# Altium PCB PDBMCU.PcbDoc (part 1 of 3)
Units mil, origin at the board's own origin, x right, y up, seen from the top; angles counter-clockwise.
Board outline 5245 x 4685 mil, 4 copper layers (Top Layer, Second Layer, Third Layer, Bottom Layer), stack 60.674 mil thick; 139 components, 73 nets, 640 pads, 472 vias.
Unrouted connection lines stored in the file: 2.
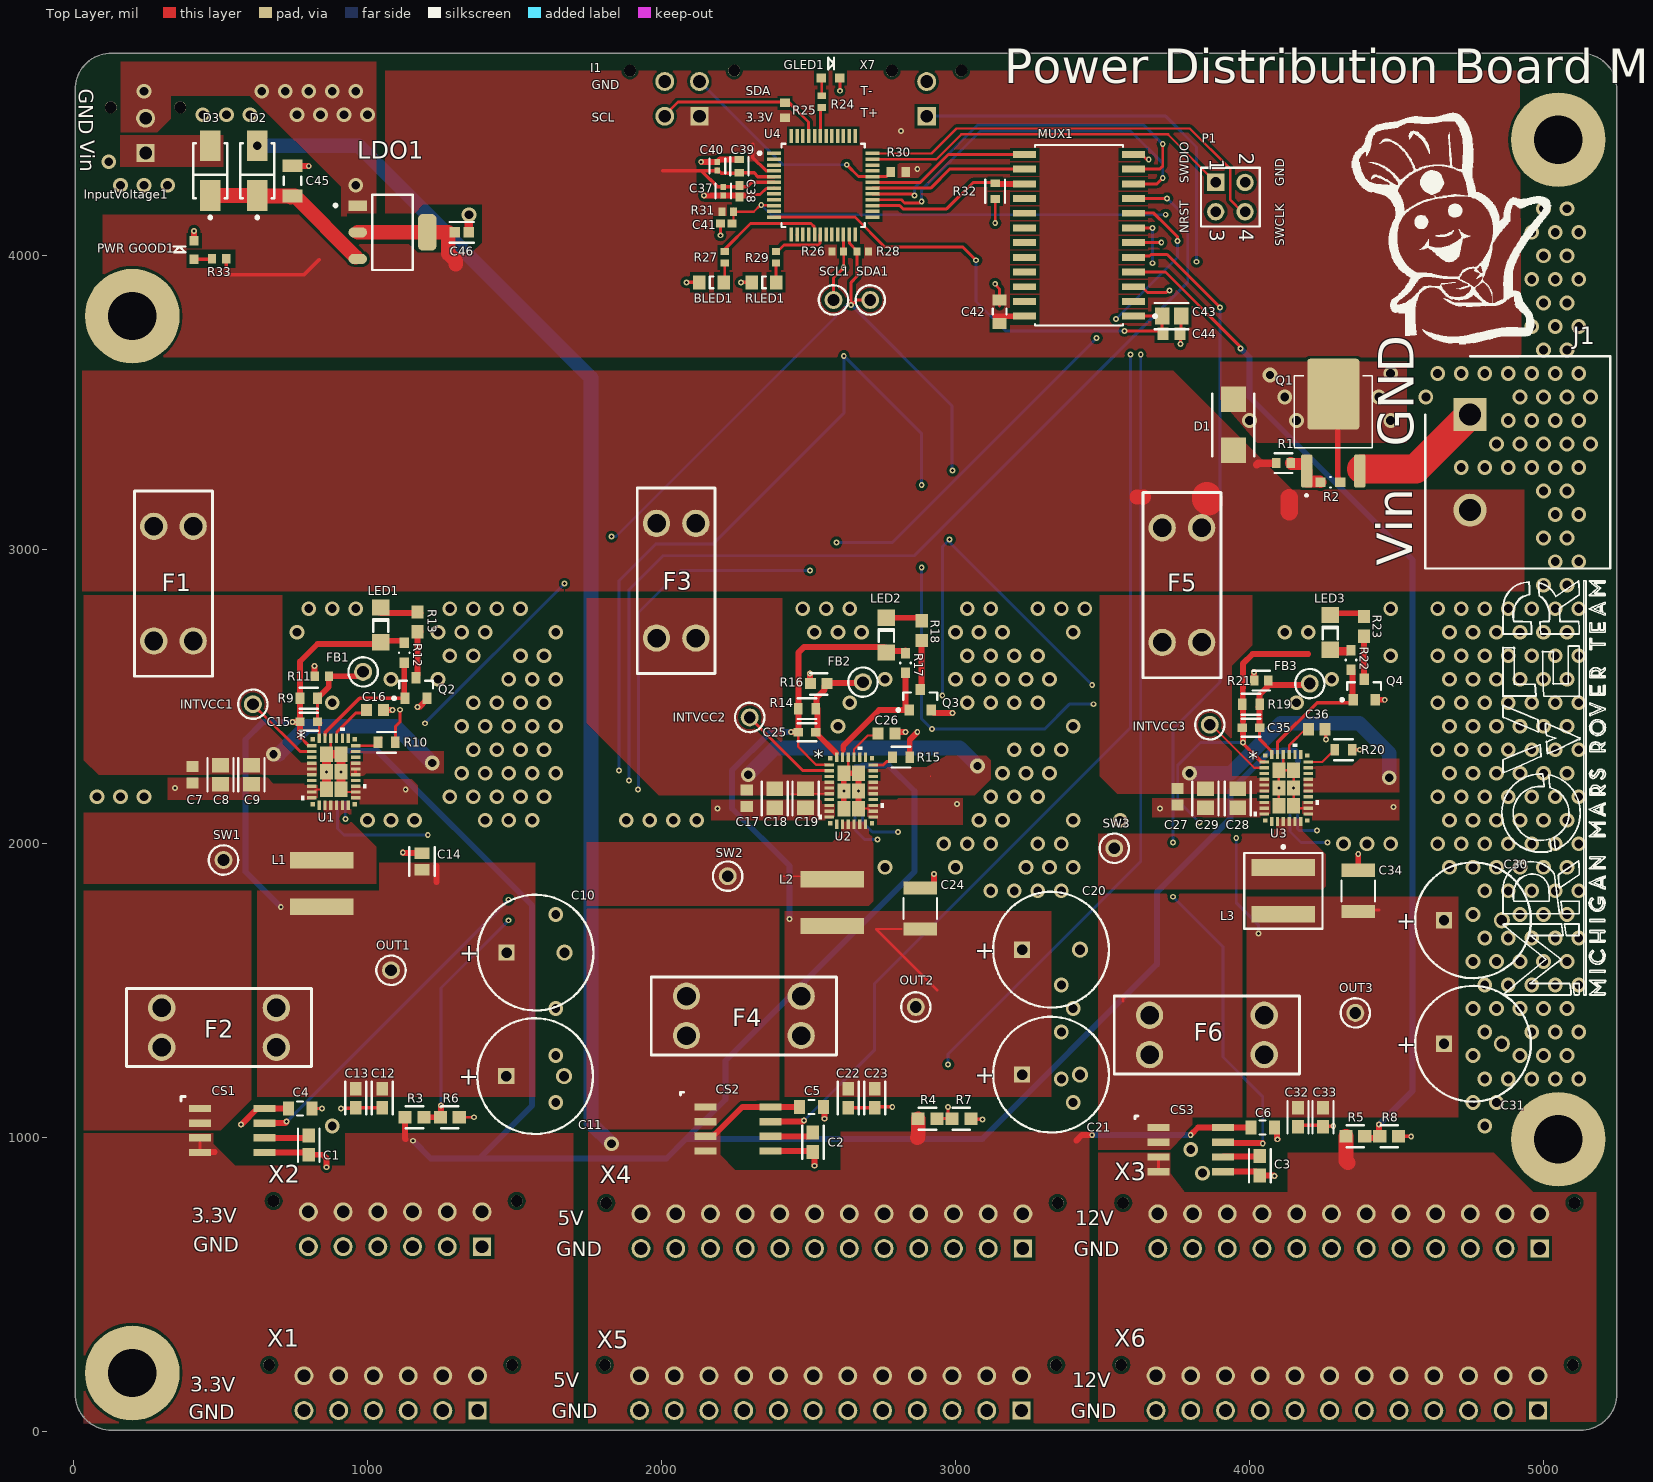
[diagram p0: Top Layer view]
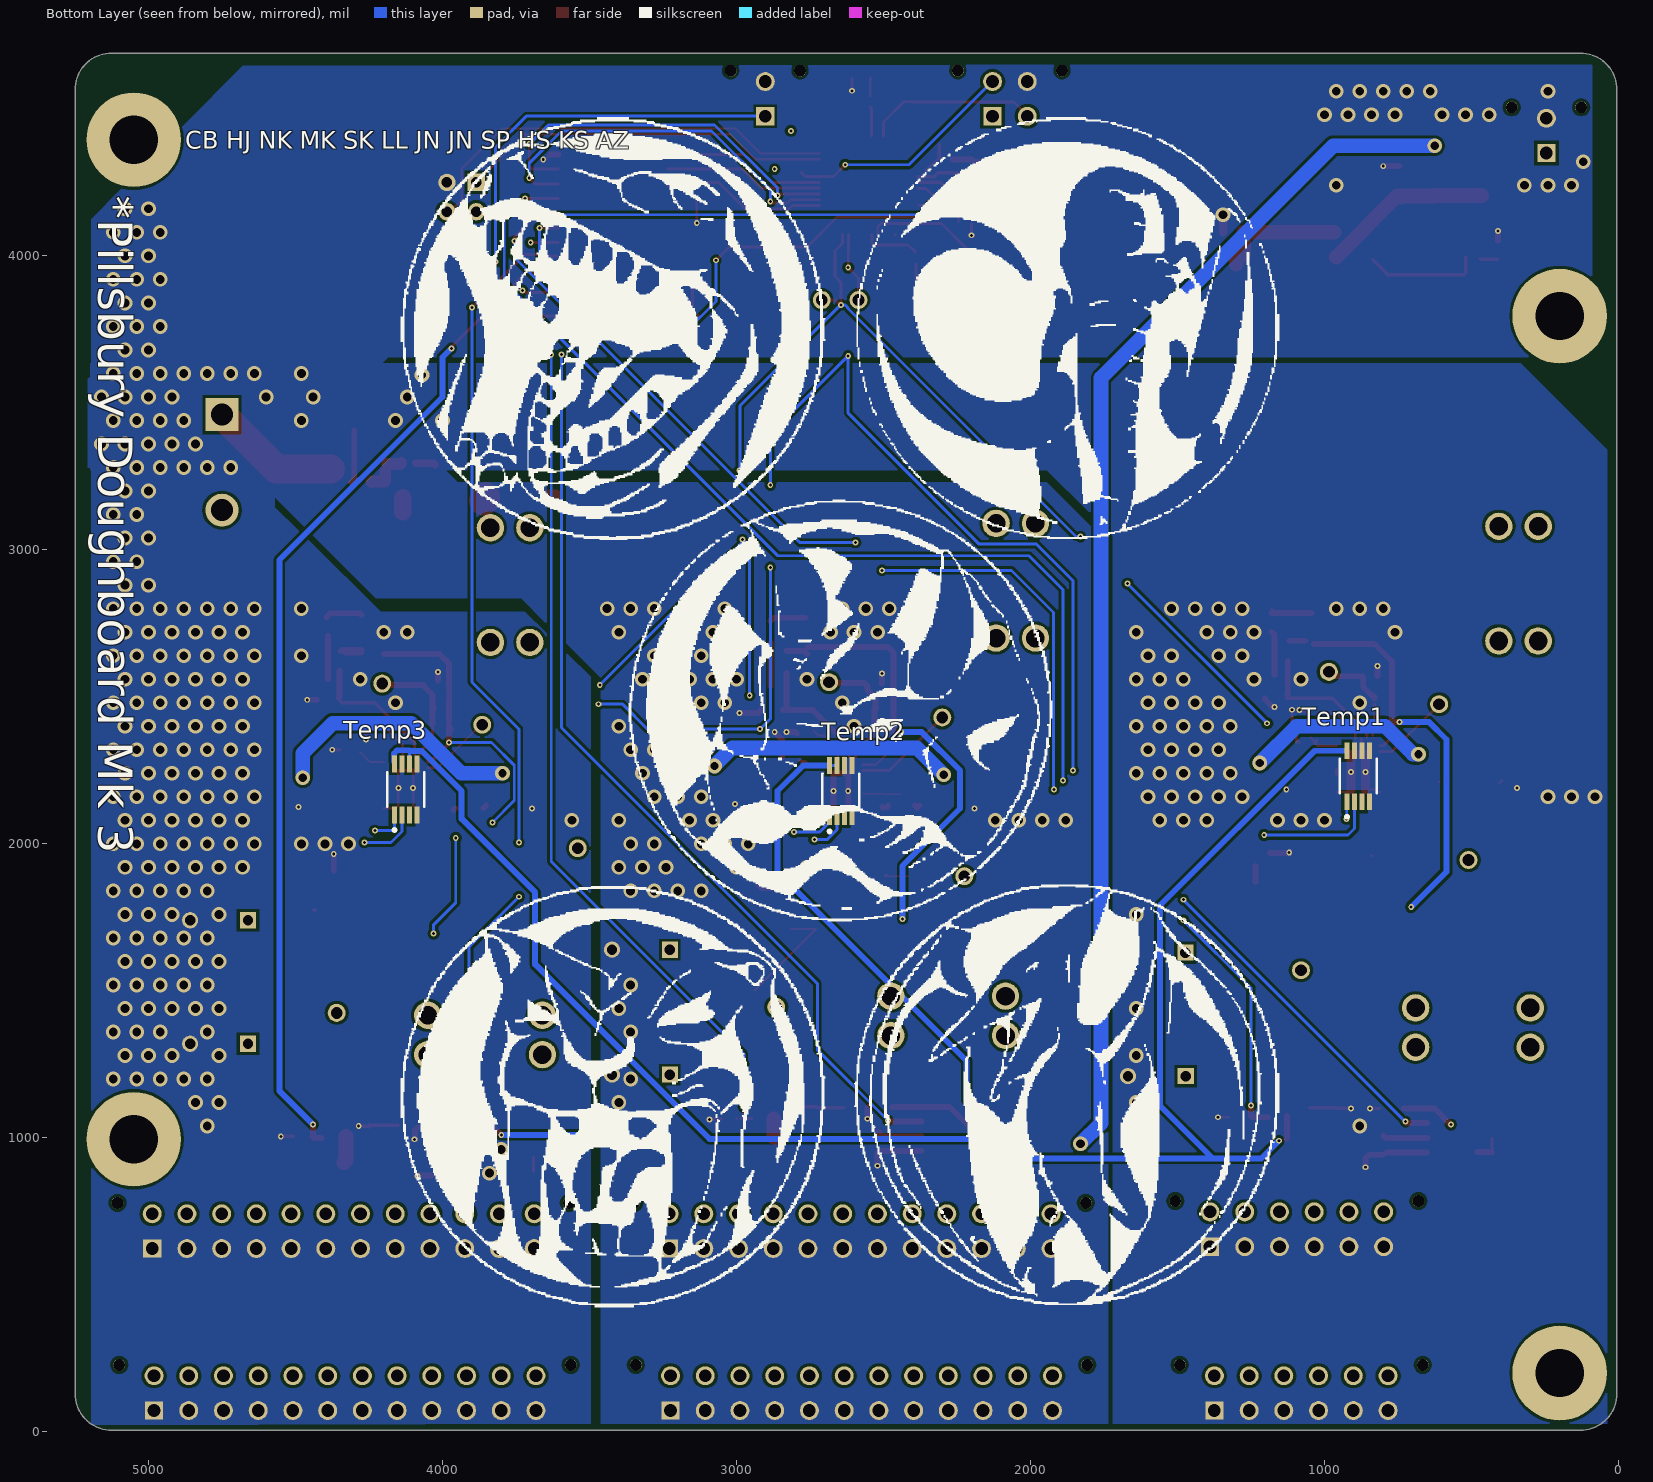
[diagram p1: Bottom Layer view, seen from below]
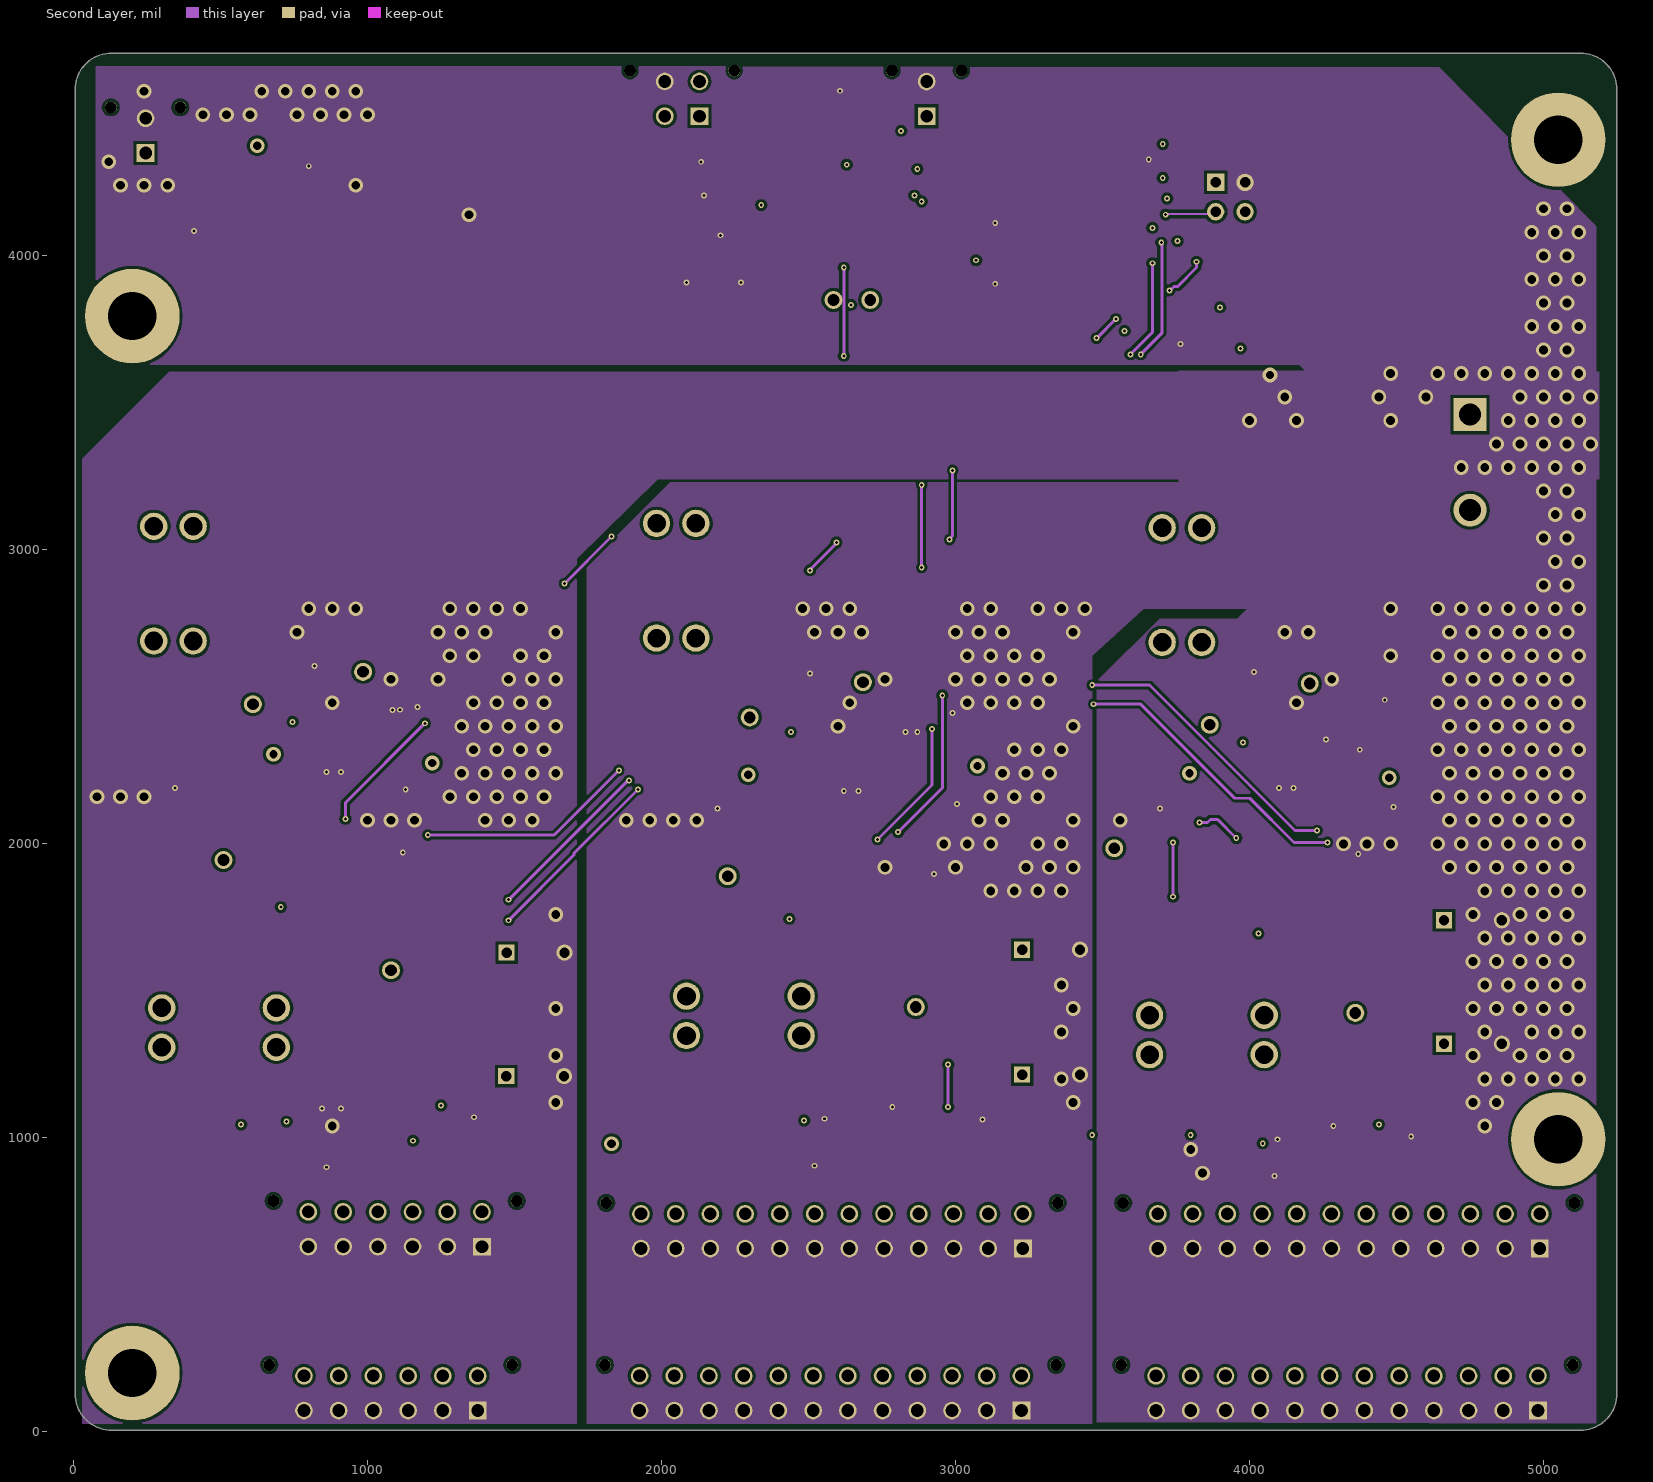
[diagram p2: Second Layer]
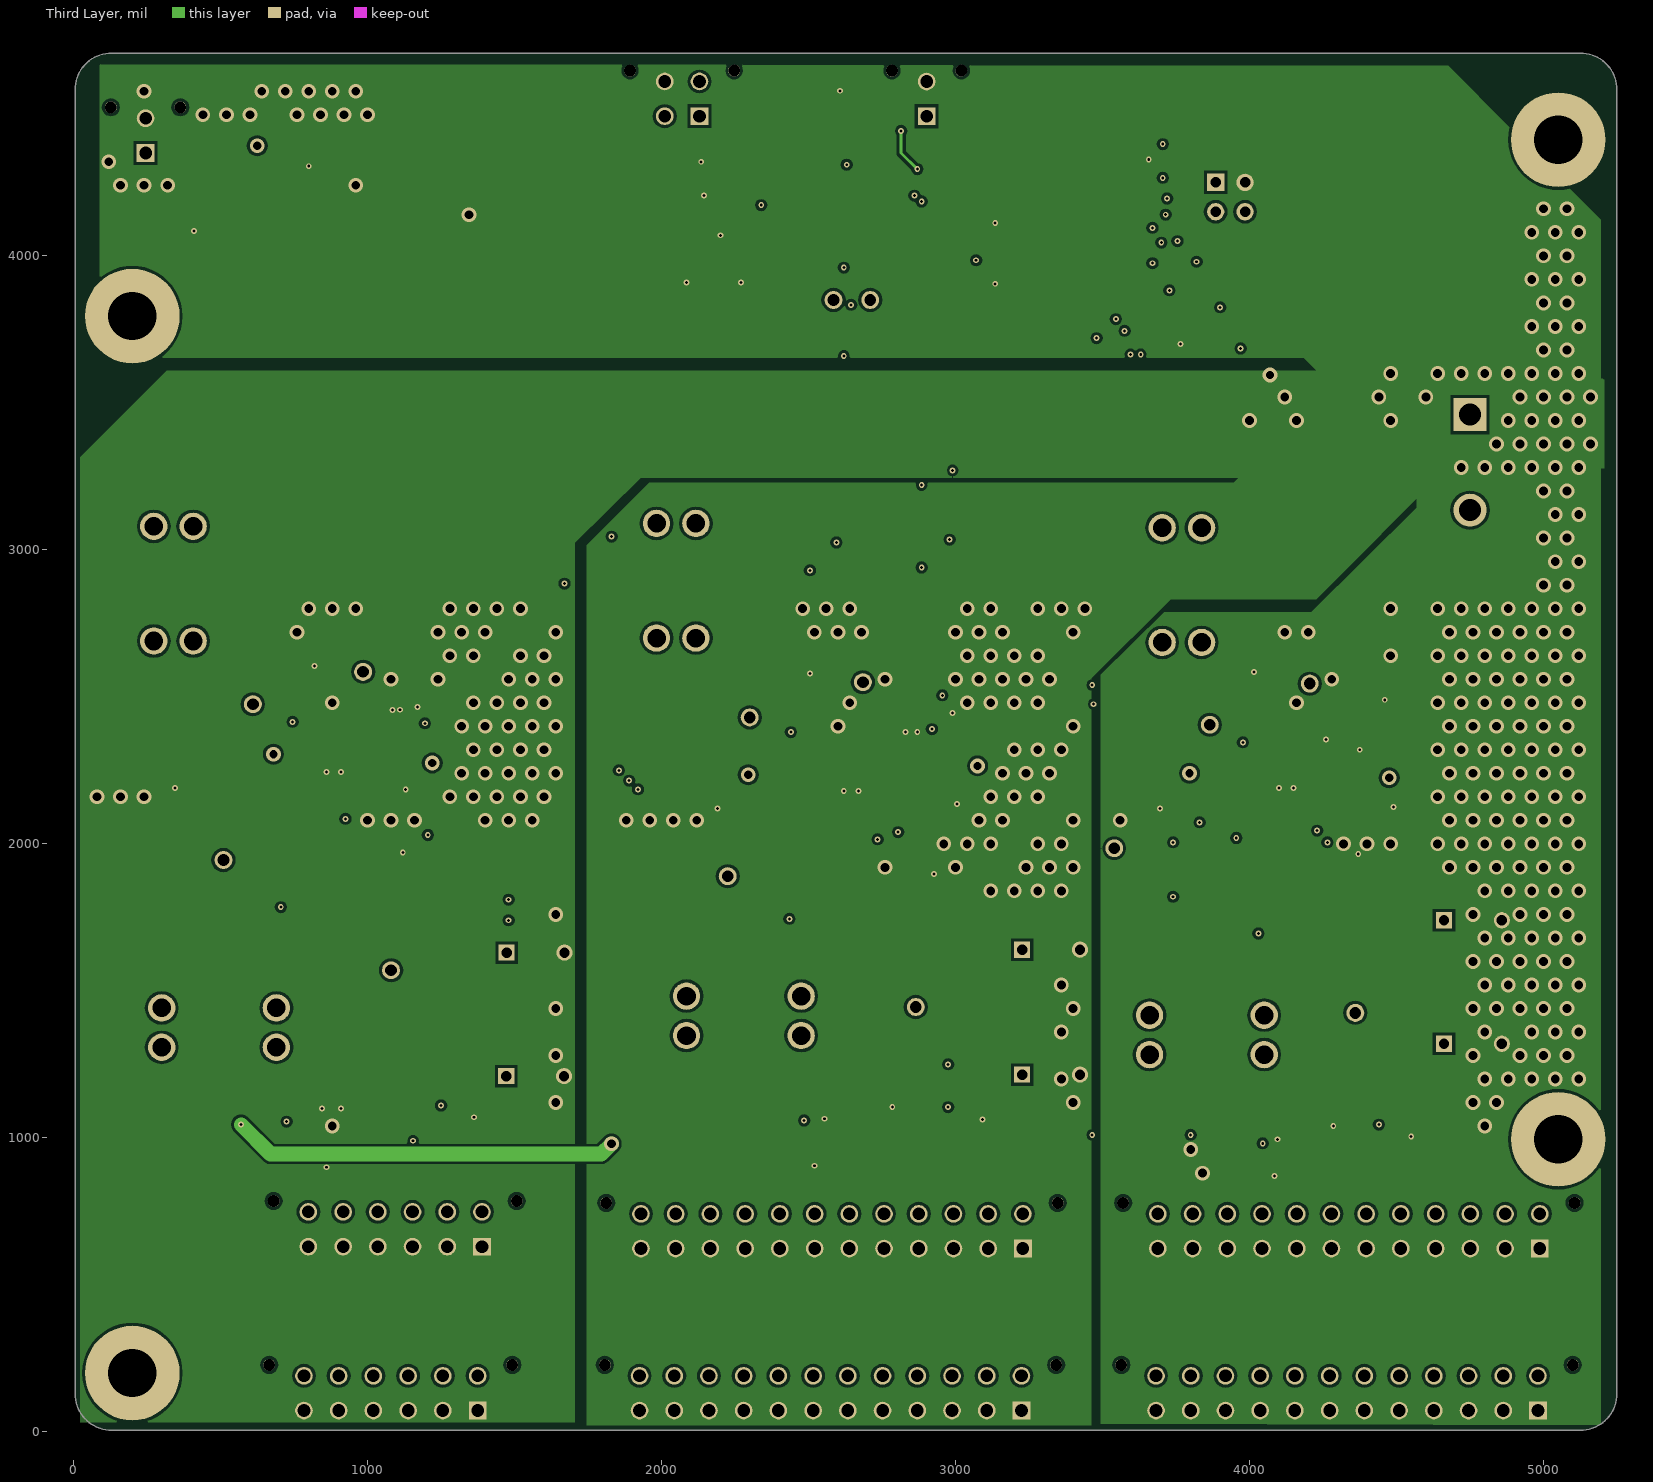
[diagram p3: Third Layer]
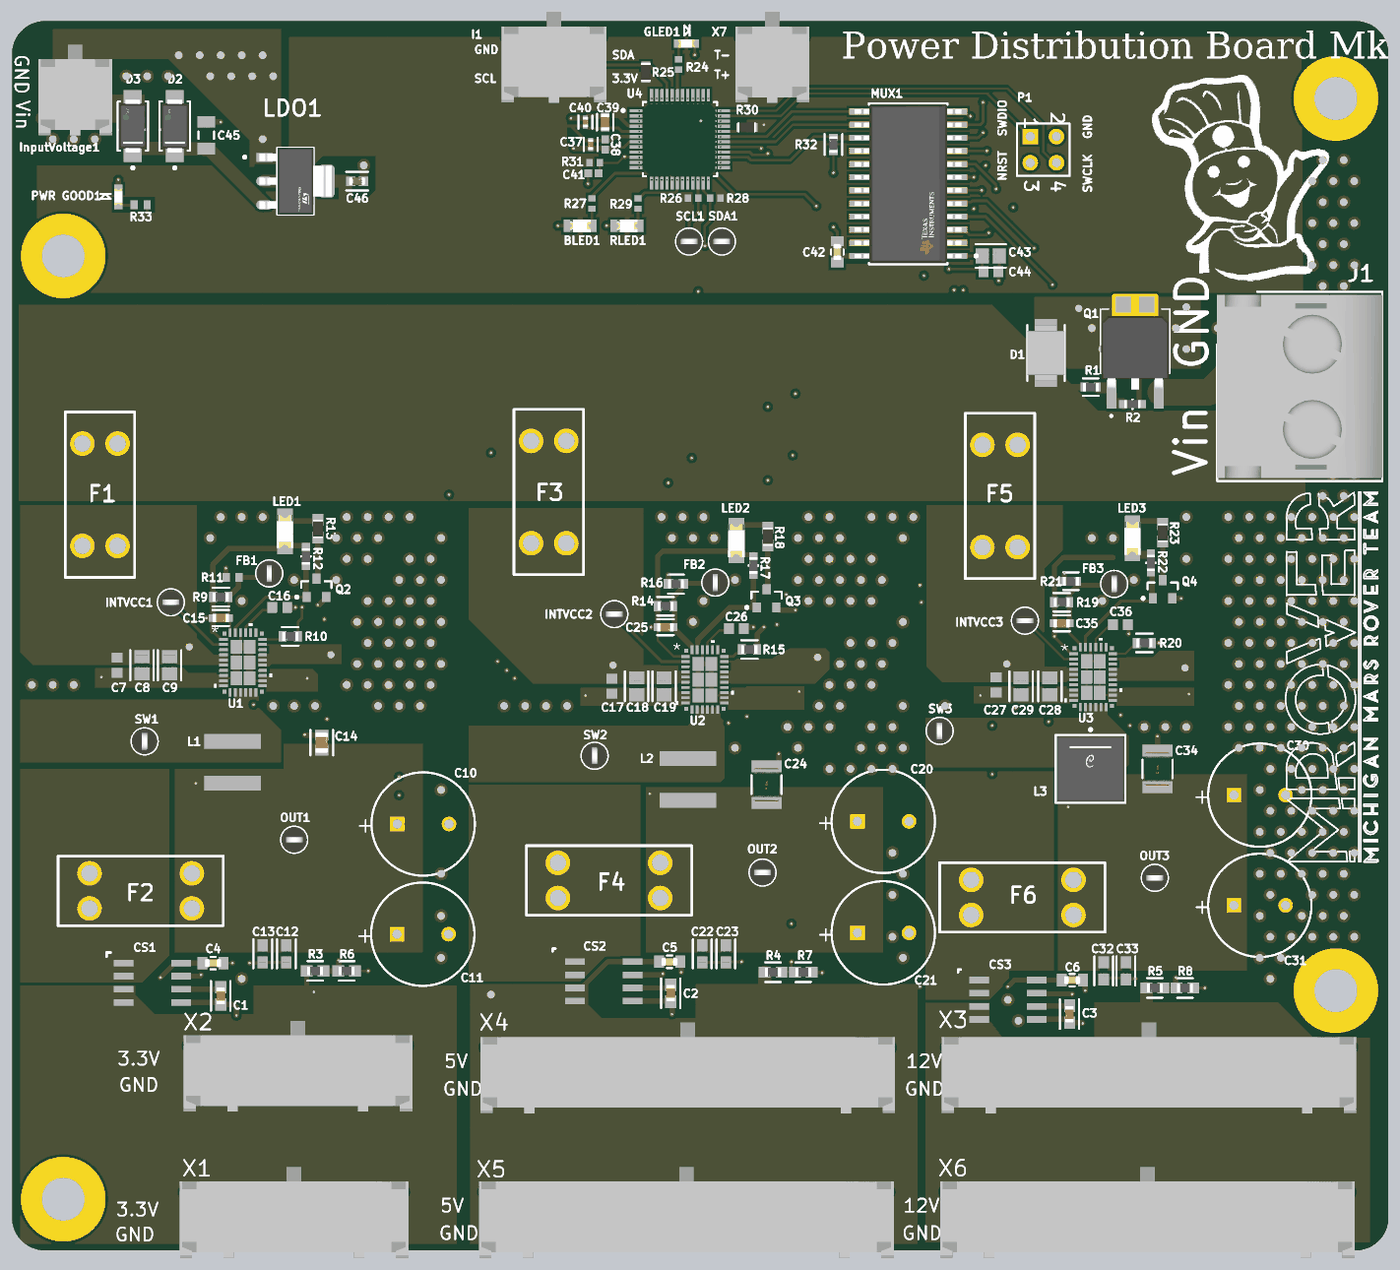
[diagram p5: 3D render of the assembled board from above, using the file's embedded part models]
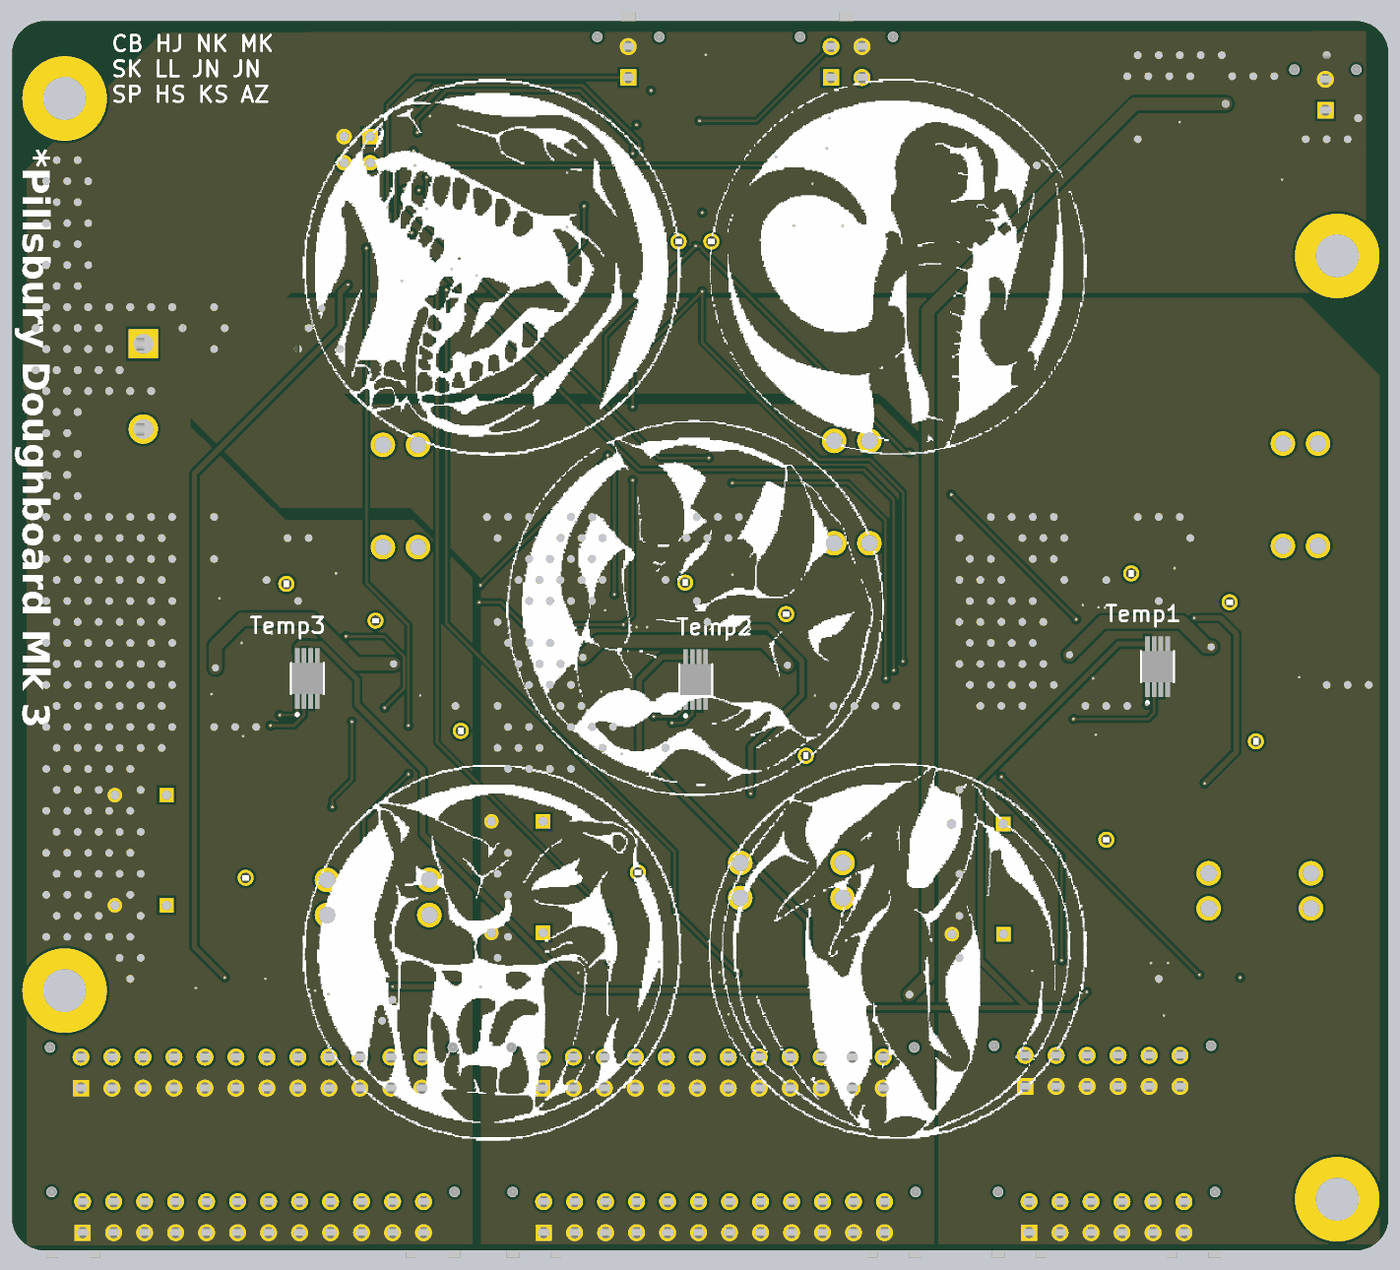
[diagram p6: 3D render of the assembled board from below, using the file's embedded part models]

## Layer stack, top to bottom
Top Solder: solder mask 0.4, Solder Resist, Dk 3.5
Top Layer: signal copper 1.4
Dielectric 4: prepreg 7.874, PP-006, Dk 4.1
Second Layer: signal copper 1.378
Dielectric 1: core 39.37, Core-009, Dk 4.5
Third Layer: signal copper 1.378
Dielectric 5: prepreg 7.874, PP-006, Dk 4.1
Bottom Layer: signal copper 1.4
Bottom Solder: solder mask 0.4, Solder Resist, Dk 3.5

## Board outline
130,5 cw(c130,130) 5,130 5,4565 cw(c130,4565) 130,4690 5125,4690 cw(c5125,4565) 5250,4565 5250,130 cw(c5125,130) 5125,5

## Design rules (kind name [scope] priority, off if disabled: settings)
Clearance [All] p1: gap=10 ignorepadtopadclearanceinfootprint=TRUE except(0: Arc-Hole Track-Hole SMDPad-Hole THPad-Hole Via-Hole Fill-Hole Poly-Hole Region-Hole Text-Hole; 6: Arc-Arc Arc-Track Arc-SMDPad Track-Track Track-SMDPad)
PolygonConnect [All] p1: connectstyle=Direct reliefconductorwidth=10 reliefentries=4 polygonreliefangle="90 Angle" airgapwidth=10
RoutingVias [All] p1: holewidth=28 width=50 viastyle="Through Hole" minholewidth=10 minwidth=20 maxholewidth=10 maxwidth=20
SolderMaskExpansion [isVia] p1: expansion=4 istentingtop=TRUE
Width [All] p1: maxlimit=200 minlimit=5 preferedwidth=10 minimp=50.000000 maximp=50.000000 favimp=50.000000
30 further rules are at their usual default settings.

## Classes and differential pairs
component class Connectors: I1 P1
component class Power: C45 C46 D2 D3 LDO1 "PWR GOOD1" R33
component class MCU: BLED1 C37 C38 C39 C40 C41 GLED1 InputVoltage1 R24 R27 R29 R32 R33 RLED1 SCL1 SDA1 U4
component class Analog_Mux: C42 C43 C44 MUX1 R32 X1
component class 12V: C27 C28 C29 C30 C31 C32 C33 C34 C35 C36 F5 F6 FB3 INTVCC3 L3 LED3 OUT3 Q4 R19 R20 R21 R22 R23 SW3 U3
component class 5V: C17 C18 C19 C20 C21 C22 C23 C24 C25 C26 F3 F4 FB2 INTVCC2 L2 LED2 OUT2 Q3 R14 R15 R16 R17 R18 SW2 U2
component class 3.3V: C7 C8 C9 C10 C11 C12 C13 C14 C15 C16 F1 F2 FB1 INTVCC1 L1 LED1 OUT1 Q2 R9 R10 R11 R12 R13 SW1 U1

## Components (designator, comment, footprint, x,y, rotation, side; value= is the part's Value field where it differs from the comment)
BLED1 "150080BS75000" 0805_A 2170,3910 r0 top
C1 "1n" FP-0603-L_1_6_0_15-W_0_81-IPC_A 800,975 r270 top
C2 "1n" FP-0603-L_1_6_0_15-W_0_81-IPC_A 2515,985 r270 top
C3 "1n" FP-0603-L_1_6_0_15-W_0_81-IPC_A 4035,905 r270 top
C4 "100n" FP-CGA3E-0_3-0_1-IPC_A 771.06,1100 r0 top
C5 "100n" FP-CGA3E-0_3-0_1-IPC_A 2510.35,1105 r0 top
C6 "100n" FP-CGA3E-0_3-0_1-IPC_A 4045,1035 r0 top
C7 "4.7p" CAPC1608X90X35ML10T15 405,2235 r90 top
C8 "0.47p" FP-CL21-IPC_B 500,2235 r270 top
C9 "0.47p" FP-CL21-IPC_B 605,2235 r270 top
C10 "220uF" CAPPR65-500-1250X1000X1350 1571.57,1630 r0 top
C11 "220uF" CAPPR65-500-1250X1000X1350 1570,1210 r0 top
C12 "100n" FP-CL10-IPC_A 1050,1135 r270 top
C13 "100n" FP-CL10-IPC_A 960,1135 r270 top
C14 "10u" FP-GRM21B-0_15-IPC_C 1185,1940 r90 top
C15 "4.7p" FP-0603-L_1_6_0_15-W_0_81-MFG 800,2415 r0 top
C16 "22n" CAPC1608X90X35ML10T15 1025,2455 r180 top
C17 "4.7p" CAPC1608X90X35ML10T15 2290,2155 r90 top
C18 "0.47p" FP-CL21-IPC_B 2385,2155 r270 top
C19 "0.47p" FP-CL21-IPC_B 2490,2155 r270 top
C20 "220uF" CAPPR65-500-1250X1000X1350 3325,1640 r0 top
C21 "220uF" CAPPR65-500-1250X1000X1350 3325,1215 r0 top
C22 "100n" FP-CL10-IPC_A 2635,1135 r270 top
C23 "100n" FP-CL10-IPC_A 2725,1135 r270 top
C24 "10u" FP-CGA6P-IPC_A 2880,1780 r90 top
C25 "4.7p" FP-0603-L_1_6_0_15-W_0_81-MFG 2495,2380 r0 top
C26 "22n" CAPC1608X90X35ML10T15 2765,2375 r180 top
C27 "4.7p" CAPC1608X90X35ML10T15 3755,2160 r90 top
C28 "0.47p" FP-CL21-IPC_B 3960,2155 r270 top
C29 "0.47p" FP-CL21-IPC_B 3850,2155 r270 top
C30 "220uF" CAPPR65-500-1250X1000X1350 4760,1740 r0 top
C31 "220uF" CAPPR65-500-1250X1000X1350 4760,1320 r0 top
C32 "100n" FP-CL10-IPC_A 4165,1070 r270 top
C33 "100n" FP-CL10-IPC_A 4250,1070 r270 top
C34 "10u" FP-CGA6P-IPC_A 4370,1840 r90 top
C35 "4.7p" FP-0603-L_1_6_0_15-W_0_81-MFG 4005,2395 r0 top
C36 "22n" CAPC1608X90X35ML10T15 4228.54,2390 r180 top
C37 "4.7u" FP-CL282-IPC_C 2210,4220 r270 top
C38 "100n" CAPC1050X55X23ML05T13 2265,4220 r90 top
C39 "100n" FP-CL10-0_1-MFG 2265,4305 r90 top value=100nF
C40 "1u" FP-CL542-IPC_C 2190,4305 r90 top
C41 "100n" CAPC1050X55X23ML05T13 2220,4110 r0 top
C42 "100n" FP-CGA3E-0_3-0_1-IPC_A 3150,3810 r90 top
C43 "0.47p" FP-CL21-IPC_B 3735,3795 r0 top
C44 "4.7p" CAPC1608X90X35ML10T15 3735,3735 r180 top
C45 "1u" CAPC3216X110X50LL20T25 745,4255 r270 top
C46 "4.7u" FP-GRM188-0_2-IPC_C 1320,4080 r0 top
CS1 "ACHS-7121-000E" ACHS-7121-000E 540,1025 r270 top
CS2 "ACHS-7121-000E" ACHS-7121-000E 2260,1030 r270 top
CS3 "ACHS-7121-000E" ACHS-7121-000E 3800.32,960 r270 top
D1 "SMBJ43CA-Q" DIONM5436X244N 3945,3425 r90 top
D2 "SS14" FP-403AE-MFG 625,4290 r270 top
D3 "SS14" FP-403AE-MFG 465,4290 r270 top
F1 "36-3568-ND" PCBComponent_1#1 340,2885 r90 top
F2 "36-3568-ND" PCBComponent_1#1 495,1375 r180 top
F3 "36-3568-ND" PCBComponent_1#1 2050,2895 r90 top
F4 "36-3568-ND" PCBComponent_1#1 2280,1415 r180 top
F5 "36-3568-ND" PCBComponent_1#1 3770,2880 r90 top
F6 "36-3568-ND" PCBComponent_1#1 3855,1350 r180 top
FB1 "5001" KSTN-5001 985,2585 r0 top
FB2 "5001" KSTN-5001 2685,2550 r0 top
FB3 "5001" KSTN-5001 4205,2545 r0 top
GLED1 "150060VS75000" WE-150060VS75000_V 2575,4605 r180 top
I1 "Molex - Micro-Fit 3.0 Series connector,  3.00mm (0.118\") pitch header, 4 positions." 44914-0401 2070,4475 r0 top
InputVoltage1 "Molex - Micro-Fit 3.0 Series connector,  3.00mm (0.118\") pitch header, 2 positions." 44914-0201 245,4350 r0 top
INTVCC1 "5001" KSTN-5001 610,2475 r90 top
INTVCC2 "5001" KSTN-5001 2300,2430 r90 top
INTVCC3 "5001" KSTN-5001 3865,2405 r90 top
J1 "1546927-2" SHDR2W119P0X826_1X2_1770X1549X1549P 4750,3460 r270 top
L1 "1u" PCBComponent_1#2 845,1865 r270 top
L2 "1u" PCBComponent_1#2 2580,1800 r270 top
L3 "4.7u" FP-XAL6060-472MEC-MFG 4115,1840 r270 top
LDO1 "LDL1117S33R" FP-SOT223-0046067-IPC_C 1085,4080 r0 top
LED1 "150120VS75000" 1206_A 1045,2745 r270 top
LED2 "150120VS75000" 1206_A 2765,2710 r270 top
LED3 "150120VS75000" 1206_A 4275,2719.06 r270 top
MUX1 "CD74HC4067M96" FP-DW0024A-MFG 3420,4070 r180 top
OUT1 "5001" KSTN-5001 1080,1570 r90 top
OUT2 "5001" KSTN-5001 2865,1445 r90 top
OUT3 "5001" KSTN-5001 4360,1425 r90 top
P1 "Header 2X2" HDR2X2 3885,4250 r270 top
"PWR GOOD1" "150060VS75000" WE-150060VS75000_V 410,4020 r270 top
Q1 "IRLR2705TRPBF" IRLR2705TRPBF 4285,3431.18 r90 top
Q2 "IRLML0060TRPBF" INTR-SOT-23-3_V 1165,2530 r0 top
Q3 "IRLML0060TRPBF" INTR-SOT-23-3_V 2880,2490 r0 top
Q4 "IRLML0060TRPBF" INTR-SOT-23-3_V 4390,2525 r0 top
R1 "200k" FP-CRCW0603-e3-IPC_C 4115.77,3295 r0 top
R2 "100k" FP-RC0603-0_55-MFG 4275,3230 r0 top
R3 "3.9k" FP-CRCW0603-e3-IPC_A 1160,1070 r180 top
R4 "3.9k" FP-CRCW0603-e3-IPC_A 2905,1065 r180 top
R5 "3.9k" FP-CRCW0603-e3-IPC_A 4360,1005 r180 top
R6 "300" FP-CRCW0603-e3-IPC_A 1280,1070 r180 top
R7 "300" FP-CRCW0603-e3-IPC_A 3020,1065 r180 top
R8 "300" FP-CRCW0603-e3-IPC_A 4475,1005 r180 top
R9 "1M" FP-CRCW0603-e3-MFG 800,2495 r180 top
R10 "41.2k" FP-CRCW0603-e3-MFG 1065,2345 r180 top
R11 "412k" RESC1608X55X30LL15T15 845,2570 r0 top
R12 "100k" FP-RC0603-0_55-MFG 1125,2650 r90 top
R13 "120" RESC1609X55X30ML15T15 1170,2755 r90 top
R14 "1M" FP-CRCW0603-e3-MFG 2495,2460 r180 top
R15 "41.2k" FP-CRCW0603-e3-MFG 2815,2295 r180 top
R16 "232k" FP-CRCW0603-e3-IPC_B 2535,2545 r0 top
R17 "100k" FP-RC0603-0_55-MFG 2830,2615 r90 top
R18 "120" RESC1609X55X30ML15T15 2885,2725 r90 top
R19 "1M" FP-CRCW0603-e3-MFG 4005,2475 r180 top
R20 "41.2k" FP-CRCW0603-e3-MFG 4320,2320 r180 top
R21 "82k" FP-CRCW0603-e3-IPC_C 4040,2555 r0 top
R22 "100k" FP-RC0603-0_55-MFG 4345,2625 r90 top
R23 "120" RESC1609X55X30ML15T15 4390,2740 r90 top
R24 "120" 0402WGF1200TCE 2545,4525 r90 top
R25 "10k" RESC1609X55X30LL15T15 2420,4495 r90 top
R26 "4.7k" 0402WGF4701TCE 2600,4015 r180 top
R27 "120" 0402WGF1200TCE 2215,3995 r90 top
R28 "4.7k" 0402WGF4701TCE 2685,4015 r0 top
R29 "120" 0402WGF1200TCE 2390,3995 r90 top
R30 "10k" RESC1609X55X30LL15T15 2805,4285 r180 top
R31 "10k" 0402WGF1002TCE 2225,4150 r0 top
R32 "10k" FP-RC0603-0_55-IPC_C 3135,4220 r90 top
R33 "120" RESC1608X55X30LL15T15 495,3990 r180 top
RLED1 "150080RS75000" 0805_A 2348.66,3910 r0 top
SCL1 "5001" KSTN-5001 2585,3850 r90 top
SDA1 "5001" KSTN-5001 2710,3850 r90 top
SW1 "5001" KSTN-5001 510,1945 r0 top
SW2 "5001" KSTN-5001 2225,1890 r0 top
SW3 "5001" KSTN-5001 3540,1985 r0 top
Temp1 "MCP9808T-E/MS" FP-C04-111-MFG 885,2230 r90 bottom
Temp2 "MCP9808T-E/MS" FP-C04-111-MFG 2645,2180 r90 bottom
Temp3 "MCP9808T-E/MS" FP-C04-111-MFG 4125,2185 r90 bottom
U1 "LT8645SEV" LQFN-32 885,2245 r0 top value=Value
U2 "LT8645SEV" LQFN-32 2645,2180 r0 top value=Value
U3 "LT8645SEV" LQFN-32 4125,2190 r0 top value=Value
U4 "STM32G050CBT6" FP-LQFP48-5B-MFG 2550,4240 r0 top
X1 "Molex - Micro-Fit 3.0 Series connector,  3.00mm (0.118\") pitch header, 12 positions." 44914-1201 1079.06,72.5 r0 top
X2 "Molex - Micro-Fit 3.0 Series connector,  3.00mm (0.118\") pitch header, 12 positions." 44914-1201 1094.06,630 r0 top
X3 "Molex - Micro-Fit 3.0 Series connector,  3.00mm (0.118\") pitch header, 24 positions." 44914-2401 4337.83,623.43 r0 top
X4 "Molex - Micro-Fit 3.0 Series connector,  3.00mm (0.118\") pitch header, 24 positions." 44914-2401 2579.72,623.43 r0 top
X5 "Molex - Micro-Fit 3.0 Series connector,  3.00mm (0.118\") pitch header, 24 positions." 44914-2401 2574.72,72.5 r0 top
X6 "Molex - Micro-Fit 3.0 Series connector,  3.00mm (0.118\") pitch header, 24 positions." 44914-2401 4331.61,72.5 r0 top
X7 "Molex - Micro-Fit 3.0 Series connector,  3.00mm (0.118\") pitch header, 2 positions." 44914-0201 2901.89,4474.88 r0 top

## Footprints (in the part's own frame and the unit in brackets; to place one, negate y for a bottom-side part, rotate by r counter-clockwise, add the part's x,y. Pads: shape width x height; smd on the part's side, far side on the other; paste and mask are expansions set on the pad)
0402WGF1002TCE [mm] "1/16W ±1% ±100ppm/? 10kO 0402 Chip Resistor - Surface Mount ROHS"
  rect 0.6x0.7 smd: 1(-0.5,0) 2(0.5,0)
0402WGF1200TCE [mm] "±1% 1/16W ±100ppm/? 120O 0402 Chip Resistor - Surface Mount ROHS"
  rect 0.6x0.7 smd: 1(-0.5,0) 2(0.5,0)
0402WGF4701TCE [mm] "1/16W ±1% 4.7kO ±100ppm/? 0402 Chip Resistor - Surface Mount ROHS"
  rect 0.6x0.7 smd: 1(-0.5,0) 2(0.5,0)
0805_A [mm] "Chip LED, 2-Leads, Body 2.0x1.3mm, IPC Medium Density"
  rect 1.1x1.2 smd: 1(-1.05,0) 2(1.05,0)
  silkscreen extent -0.15,-0.5 0.15,0.5, body extent -1,-0.62 1,0.63, height 0.68
1206_A [mm] "Chip LED, 2-Leads, Body 3.2x1.6mm, IPC Medium Density"
  rect 1.4x1.5 smd: 1(-1.5,0) 2(1.5,0)
  silkscreen extent -0.5,-0.66 0.6,0.65, body extent -1.6,-0.8 1.6,0.8, height 0.68
44914-0201 [mm]
  round 1.02 hole 1.02 unplated: 1(-3,3.94) 1(3,3.94)
  rect 1.583x1.583 / inner rect 1.524x1.524 / far side rect 1.583x1.583 hole 1.09: P$1(0,0)
  round 1.635 / inner round 1.524 / far side round 1.635 hole 1.09: P$2(0,3)
  body extent -3.57,-2.45 3.58,6.35, height 10.03
44914-0401 [mm]
  round 1.02 hole 1.02 unplated: 1(-4.5,3.94) 1(4.5,3.94)
  rect 1.583x1.583 / inner rect 1.524x1.524 / far side rect 1.583x1.583 hole 1.09: P$1(1.5,0)
  round 1.635 / inner round 1.524 / far side round 1.635 hole 1.09: P$2(-1.5,0) P$3(1.5,3) P$4(-1.5,3)
  body extent -5.07,-2.45 5.08,6.35, height 10.03
44914-1201 [mm]
  round 1.02 hole 1.02 unplated: 1(-10.5,3.94) 1(10.5,3.94)
  rect 1.583x1.583 / inner rect 1.524x1.524 / far side rect 1.583x1.583 hole 1.09: P$1(7.5,0)
  round 1.635 / inner round 1.524 / far side round 1.635 hole 1.09: P$2(4.5,0) P$3(1.5,0) P$4(-1.5,0) P$5(-4.5,0) P$6(-7.5,0) P$7(7.5,3) P$8(4.5,3) P$9(1.5,3) P$10(-1.5,3) P$11(-4.5,3) P$12(-7.5,3)
  body extent -11.07,-2.45 11.08,6.35, height 10.03
44914-2401 [mm]
  round 1.02 hole 1.02 unplated: 1(-19.5,3.94) 1(19.5,3.94)
  rect 1.583x1.583 / inner rect 1.524x1.524 / far side rect 1.583x1.583 hole 1.09: P$1(16.5,0)
  round 1.635 / inner round 1.524 / far side round 1.635 hole 1.09: P$2(13.5,0) P$3(10.5,0) P$4(7.5,0) P$5(4.5,0) P$6(1.5,0) P$7(-1.5,0) P$8(-4.5,0) P$9(-7.5,0) P$10(-10.5,0) P$11(-13.5,0) P$12(-16.5,0) P$13(16.5,3) P$14(13.5,3) P$15(10.5,3) P$16(7.5,3) P$17(4.5,3) P$18(1.5,3) P$19(-1.5,3) P$20(-4.5,3) P$21(-7.5,3) P$22(-10.5,3) P$23(-13.5,3) P$24(-16.5,3)
  body extent -20.07,-2.45 20.08,6.35, height 10.03
ACHS-7121-000E [mil]
  rect 25x75 smd: 1(-75,-110) 2(-25,-110) 3(25,-110) 4(75,-110) 5(75,110) 6(25,110) 7(-25,110) 8(-75,110)
CAPC1050X55X23ML05T13 [mm] "Chip Capacitor, 2-Leads, Body 1.05x0.55mm, IPC Low Density"
  rect 0.76x0.72 smd: 1(-0.49,0) 2(0.49,0)
  body extent -0.53,-0.28 0.53,0.27, height 0.55
CAPC1608X90X35ML10T15 [mm] "Chip Capacitor, 2-Leads, Body 1.60x0.80mm, IPC Low Density"
  rect 0.95x1.05 smd: 1(-0.725,0) 2(0.725,0)
  body extent -0.85,-0.45 0.85,0.45, height 0.9
CAPC3216X110X50LL20T25 [mm] "Chip Capacitor, 2-Leads, Body 3.20x1.60mm, IPC High Density"
  rect 1.1x1.7 smd: 1(-1.3,0) 2(1.3,0)
  silkscreen extent -0.35,-0.75 0.35,0.75, body extent -1.7,-0.9 1.7,0.9, height 1.1
CAPPR65-500-1250X1000X1350 [mm] "THD, 2-Leads, Dia 10mm, Body Length 12.5mm"
  rect 1.4x1.4 hole 0.9: 1(-2.5,0)
  round 1.4 hole 0.9: 2(2.5,0)
  silkscreen extent -5,-5 5,5, body extent -5,-5 5,5, height 13.5
DIONM5436X244N [mm]
  rect 2.2x2.15 smd: 1(-2.2,0) 2(2.2,0)
  silkscreen extent -2.7,-1.81 2.7,1.81, body extent -2.7,-1.81 2.7,1.81, height 2.31
FP-403AE-MFG [mm]
  rect 2.65x1.75 smd paste+0 mask+0: 1(-2.15,0) 2(2.15,0)
  silkscreen extent -2.37,-1.48 4.17,1.48, body extent -3.57,-1.58 3.57,1.58, height 0.25
FP-0603-L_1_6_0_15-W_0_81-IPC_A [mil]
  rect 47.5x42.06 smd paste+0 mask+0: 1(-32.51,0) 2(32.51,0)
  silkscreen extent -56,-37 56,37, body extent -76,-41 76,41, height 10
FP-0603-L_1_6_0_15-W_0_81-MFG [mm]
  rect 0.8x0.75 smd paste+0 mask+0: 1(-0.75,0) 2(0.75,0)
  silkscreen extent -0.8,-0.77 0.8,0.77, body extent -1.25,-0.58 1.25,0.58, height 0.25
FP-C04-111-MFG [mm]
  rect 1.45x0.45 smd paste+0 mask+0: 1(-2.2,0.975) 2(-2.2,0.325) 3(-2.2,-0.325) 4(-2.2,-0.975) 5(2.2,-0.975) 6(2.2,-0.325) 7(2.2,0.325) 8(2.2,0.975)
  silkscreen extent -3.62,-1.6 1.5,1.6, body extent -1.5,-1.5 1.5,1.5, height 1.1
FP-CGA3E-0_3-0_1-IPC_A [mm]
  rect 0.956x1.206 smd paste+0 mask+0: 1(-1.025,0) 2(1.025,0)
  silkscreen extent -0.25,-0.6 0.25,0.6, body extent -2,-1.1 2,1.1, height 0.25
FP-CGA6P-IPC_A [mm]
  rect 1.153x2.904 smd paste+0 mask+0: 1(-1.775,0) 2(1.775,0)
  silkscreen extent -0.9,-1.45 0.9,1.45, body extent -2.85,-1.95 2.85,1.95, height 0.25
FP-CL10-0_1-MFG [mm]
  rect 0.625x0.825 smd paste+0 mask+0: 1(-0.575,0) 2(0.575,0)
  silkscreen extent -0.8,-0.79 0.8,0.79, body extent -0.99,-0.55 0.99,0.55, height 0.25
FP-CL10-IPC_A [mil]
  rect 45.6x39.85 smd paste+0 mask+0: 1(-32.56,0) 2(32.56,0)
  silkscreen extent -55,-36 55,36, body extent -75,-40 75,40, height 10
FP-CL21-IPC_B [mil]
  rect 49.4x57.33 smd paste+0 mask+0: 1(-32.51,0) 2(32.51,0)
  silkscreen extent -57,-44 57,44, body extent -67,-39 67,39, height 10
FP-CL282-IPC_C [mil]
  rect 20.29x18.6 smd paste+0 mask+0: 1(-14.9,0) 2(14.9,0)
  silkscreen extent -25,-27 25,27, body extent -29,-15 29,15, height 10
FP-CL542-IPC_C [mil]
  rect 20.29x18.6 smd paste+0 mask+0: 1(-14.9,0) 2(14.9,0)
  silkscreen extent -25,-27 25,27, body extent -29,-15 29,15, height 10
FP-CRCW0603-e3-IPC_A [mil]
  rect 44.69x41.82 smd paste+0 mask+0: 1(-32.1,0) 2(32.1,0)
  silkscreen extent -30,-37 30,37, body extent -74,-41 74,41, height 10
FP-CRCW0603-e3-IPC_B [mil]
  rect 36.81x37.88 smd paste+0 mask+0: 1(-28.17,0) 2(28.17,0)
  silkscreen extent -30,-37 30,35, body extent -56,-29 56,29, height 10
FP-CRCW0603-e3-IPC_C [mil]
  rect 28.94x33.94 smd paste+0 mask+0: 1(-24.23,0) 2(24.23,0)
  silkscreen extent -30,-33 30,33, body extent -43,-23 43,23, height 10
FP-CRCW0603-e3-MFG [mm]
  rect 0.75x1 smd paste+0 mask+0: 1(-0.75,0) 2(0.75,0)
  silkscreen extent -0.8,-0.9 0.8,0.9, body extent -1.22,-0.6 1.22,0.6, height 0.25
FP-DW0024A-MFG [mm]
  rect 2x0.6 smd paste-1000 mask+0: 1(-4.7,6.985) 2(-4.7,5.715) 3(-4.7,4.445) 4(-4.7,3.175) 5(-4.7,1.905) 6(-4.7,0.635) 7(-4.7,-0.635) 8(-4.7,-1.905) 9(-4.7,-3.175) 10(-4.7,-4.445) 11(-4.7,-5.715) 12(-4.7,-6.985) 13(4.7,-6.985) 14(4.7,-5.715) 15(4.7,-4.445) 16(4.7,-3.175) 17(4.7,-1.905) 18(4.7,-0.635) 19(4.7,0.635) 20(4.7,1.905) 21(4.7,3.175) 22(4.7,4.445) 23(4.7,5.715) 24(4.7,6.985)
  silkscreen extent -6.7,-7.8 3.8,7.8, body extent -5.8,-7.98 5.8,7.98, height 0.25
FP-GRM21B-0_15-IPC_C [mil]
  rect 39.6x51.5 smd paste+0 mask+0: 1(-28.59,0) 2(28.59,0)
  silkscreen extent -48,-43 48,43, body extent -52,-31 52,31, height 10
FP-GRM188-0_2-IPC_C [mil]
  rect 35.63x35.68 smd paste+0 mask+0: 1(-23.64,0) 2(23.64,0)
  silkscreen extent -41,-35 41,35, body extent -45,-24 45,24, height 10
FP-LQFP48-5B-MFG [mm]
  rect 1.2x0.3 smd paste+0 mask+0: 1(-4.25,2.75) 2(-4.25,2.25) 3(-4.25,1.75) 4(-4.25,1.25) 5(-4.25,0.75) 6(-4.25,0.25) 7(-4.25,-0.25) 8(-4.25,-0.75) 9(-4.25,-1.25) 10(-4.25,-1.75) 11(-4.25,-2.25) 12(-4.25,-2.75) 25(4.25,-2.75) 26(4.25,-2.25) 27(4.25,-1.75) 28(4.25,-1.25) 29(4.25,-0.75) 30(4.25,-0.25) 31(4.25,0.25) 32(4.25,0.75) 33(4.25,1.25) 34(4.25,1.75) 35(4.25,2.25) 36(4.25,2.75)
  rect 0.3x1.2 smd paste+0 mask+0: 13(-2.75,-4.25) 14(-2.25,-4.25) 15(-1.75,-4.25) 16(-1.25,-4.25) 17(-0.75,-4.25) 18(-0.25,-4.25) 19(0.25,-4.25) 20(0.75,-4.25) 21(1.25,-4.25) 22(1.75,-4.25) 23(2.25,-4.25) 24(2.75,-4.25) 37(2.75,4.25) 38(2.25,4.25) 39(1.75,4.25) 40(1.25,4.25) 41(0.75,4.25) 42(0.25,4.25) 43(-0.25,4.25) 44(-0.75,4.25) 45(-1.25,4.25) 46(-1.75,4.25) 47(-2.25,4.25) 48(-2.75,4.25)
  silkscreen extent -5.62,-3.6 3.6,3.6, body extent -4.95,-4.95 4.95,4.95, height 0.25
FP-RC0603-0_55-IPC_C [mil]
  rect 25.93x31.97 smd paste+0 mask+0: 1(-26.64,0) 2(26.64,0)
  silkscreen extent -40,-33 40,33, body extent -44,-22 44,22, height 10
FP-RC0603-0_55-MFG [mm]
  rect 0.9x0.8 smd paste+0 mask+0: 1(-0.85,0) 2(0.85,0)
  silkscreen extent -0.03,-0.45 0.03,0.45, body extent -1.4,-0.55 1.4,0.55, height 0.25
FP-SOT223-0046067-IPC_C [mm]
  rect 1.604x0.88 smd paste+0 mask+0: 1(-3,2.3)
  rrect100% 1.604x0.88 smd paste+0 mask+0: 2(-3,0) 3(-3,-2.3)
  rrect55% 1.604x3.18 smd paste+0 mask+0: 4(3,0)
  silkscreen extent -5.05,-3.25 1.75,3.25, body extent -3.9,-3.35 3.9,3.35, height 0.25
FP-XAL6060-472MEC-MFG [mm]
  rect 1.43x5.5 smd paste+0 mask+0: 1(-2.02,0) 2(2.02,0)
  silkscreen extent -3.92,-3.38 3.28,3.38, body extent -3.38,-3.48 3.38,3.48, height 0.25
HDR2X2 [mm] "Connector; Header; 2x2 Position"
  rect 1.5x1.5 hole 0.9: 1(0,0)
  round 1.5 hole 0.9: 2(0,2.54) 3(2.54,0) 4(2.54,2.54)
  silkscreen extent -1.27,-1.27 3.81,3.81
INTR-SOT-23-3_V [mm] "SOT23, 3-Leads, Body 2.92x1.3mm, Pitch 1.9mm"
  rect 0.802x0.972 smd: 1(-0.95,-0.885) 2(0.95,-0.885) 3(0,0.885)
  silkscreen extent -2.03,-1.01 1.46,0.64, body extent -1.46,-0.65 1.46,0.65, height 1.12
IRLR2705TRPBF [mm]
  rrect25% 2.83x0.97 smd: 1(-4.14,2.29) 2(-4.14,-2.29)
  rrect10% 6.1x4.49 smd paste-4: 3(2.51,0)
  silkscreen extent -6.35,-3.37 4.1,3.37, body extent -4.83,-3.27 5.08,3.27
KSTN-5001 [mm] "Test Point, Through Hole, Dia 2.54mm"
  round 1.55 hole 1.016: 1(0,0)
  silkscreen extent -1.27,-1.27 1.27,1.27, body extent -1.25,-1.25 1.25,1.25, height 4.62
LQFN-32 [mil]
  rect 32x11 smd paste+0 mask+0: 1(-74.5,88.58) 2(-74.5,68.9) 3(-74.5,49.21) 4(-74.5,29.53) 5(-74.5,9.84) 6(-74.5,-9.84) 7(-74.5,-29.53) 8(-74.5,-49.21) 9(-74.5,-68.9) 10(-74.5,-88.58) 17(74.5,-88.58) 18(74.5,-68.9) 19(74.5,-49.21) 20(74.5,-29.53) 21(74.5,-9.84) 22(74.5,9.84) 23(74.5,29.53) 24(74.5,49.21) 25(74.5,68.9) 26(74.5,88.58)
  rect 11x32 smd paste+0 mask+0: 11(-49.21,-114) 12(-29.53,-114) 13(-9.84,-114) 14(9.84,-114) 15(29.53,-114) 16(49.21,-114) 27(49.21,114) 28(29.53,114) 29(9.84,114) 30(-9.84,114) 31(-29.53,114) 32(-49.21,114)
  rect 44x53 smd paste+0 mask+0: 33(-25,60) 34(25,60) 37(-25,-60) 38(25,-60)
  rect 44x52 smd paste+0 mask+0: 35(-25,0) 36(25,0)
  rect 15x15 smd paste+0 mask+0: 39(-71,110.49) 40(71,110.49) 41(-71,-110.49) 42(71,-110.49)
  silkscreen extent -110,-96 110,150, body extent 0,0 10,10, height 10
PCBComponent_1#1 [mil]
  round 93 hole 63: 1(-195,-67) 1(-195,67) 2(195,-67) 2(195,67)
  silkscreen extent -315,-133 315,133
PCBComponent_1#2 [mil]
  rect 56x216 smd: 1(-79.5,0) 2(79.5,0)
RESC1608X55X30LL15T15 [mm] "Chip Resistor, 2-Leads, Body 1.60x0.80mm, IPC High Density"
  rect 0.7x0.85 smd: 1(-0.625,0) 2(0.625,0)
  body extent -0.87,-0.48 0.87,0.48, height 0.55
RESC1609X55X30LL15T15 [mm] "Chip Resistor, 2-Leads, Body 1.75x0.95mm, IPC High Density"
  rect 0.75x0.85 smd: 1(-0.65,0) 2(0.65,0)
  body extent -0.87,-0.48 0.87,0.48, height 0.55
RESC1609X55X30ML15T15 [mm] "Chip Resistor, 2-Leads, Body 1.75x0.95mm, IPC Low Density"
  rect 1.15x1.05 smd: 1(-0.85,0) 2(0.85,0)
  body extent -0.87,-0.48 0.87,0.48, height 0.55
SHDR2W119P0X826_1X2_1770X1549X1549P [mm]
  rect 2.85x2.85 hole 1.9: 1(0,0)
  round 2.85 hole 1.9: 2(8.255,0)
  silkscreen extent -5.04,-3.87 13.3,12.13, body extent -4.72,-3.9 12.98,12.16, height 14.99
WE-150060VS75000_V [mm] "SMD, 2-Leads, Body 1.6x0.8mm"
  rect 0.8x0.8 smd: 1(-0.8,0) 2(0.8,0)
  silkscreen extent -0.3,-1.75 0.2,-0.75, body extent -0.8,-0.4 0.8,0.4, height 0.7

## Part data
BLED1: library part CMP-1426-00008-1, "SMD mono-color Chip LED, WL-SMCW, Blue", Color=Blue, Manufacturer="Wuerth Elektronik", ComponentLink1Description="Manufacturer URL", ComponentLink1URL=http://www.we-online.com, ComponentLink2Description=Datasheet, ComponentLink2URL=http://katalog.we-online.com/led/datasheet/150080BS75000.pdf, PackageReference=0805_A, PartNumber=150080BS75000
C1 C2 C3: library part CMP-2006-04378-2, "General Purpose Ceramic Capacitor, 0603, 1nF, 10%, X7R, 15%, 50V", Capacitance=1nF, Case Code (Imperial)=0603, Case Code (Metric)=1608, Dielectric=X7R, Dielectric Material=Ceramic, Max Operating Temperature=125°C, Min Operating Temperature=-55°C, Package Quantity=4000, Tolerance=10%, Voltage=50V, Case/Package=0603, Construction=Flat, Contact Plating=Tin, Depth=0.81mm, Height=0.9mm, Lead Free="Lead Free", Length=1.6mm, Mount="Surface Mount", Number of Pins=2, Packaging="Tape and Reel", Radiation Hardening=No, REACH SVHC="No SVHC", RoHS Compliant=Yes, Series=-, Termination=SMD/SMT, Thickness=0.035inch, Voltage Rating=50V, Voltage Rating (DC)=50V, Weight=7.1E-05oz, Width=0.032inch
C4 C5 C6 C42: library part CMP-2000-07546-2, "Cap Ceramic 100nF 50V X7R 10% Pad SMD 0603 +125°C Automotive T/R", Capacitance=100nF, Case Code (Imperial)=0603, Case Code (Metric)=1608, Dielectric=X7R, Max Operating Temperature=125°C, Min Operating Temperature=-55°C, Package Quantity=1, Ratings=AEC-Q200, Tolerance=10%, Voltage=50V, Case/Package=0603, Composition=Ceramic, Depth=0.8mm, Height=0.8mm, Lead Free="Lead Free", Length=1.6mm, Mount="Surface Mount", Packaging="Tape and Reel", Radiation Hardening=No, REACH SVHC="No SVHC", Termination=SMD/SMT, Thickness=0.035inch, Voltage Rating=50V, Voltage Rating (DC)=50V, Weight=7.1E-05oz, Width=0.8mm
C7 C17 C27 C44: library part CMP-2006-02676-1, Manufacturer=Murata, Part Number=GRM1885C1H4R7CA01D
C8 C9 C18 C19 C28 C29 C43: library part CMP-13271-000950-1, "CL21 Series 0805 0.47pF 50V ±0.1pF Tolerance C0G Multilayer Ceramic Chip Capacitor", Capacitance=0.47pF, Case Code (Imperial)=0805, Case Code (Metric)=2012, Dielectric=C0G, Max Operating Temperature=125°C, Min Operating Temperature=-55°C, Package Quantity=1, Temperature Coefficient=300ppm/°C, Voltage=50V, Case/Package=0805, Depth=1.25mm, Height=0.65mm, Lead Free="Lead Free", Length=2mm, Mount="Surface Mount", Packaging="Tape and Reel", Radiation Hardening=No, Thickness=0.03inch, Voltage Rating=50V, Voltage Rating (DC)=50V, Width=0.049inch
C10 C11 C20 C21 C30 C31: library part CMP-1665-00043-1, "Aluminum Electrolytic Capacitor, 220 uF, +/- 20%, 50 V, -40 to 85 degC, 2-Pin THD, RoHS, Bulk", Case\Package=SOIC, Max Operating Temperature="70 degC", Max Supply Voltage="5.5 V", Min Operating Temperature="0 degC", Min Supply Voltage="4.5 V", Nominal Supply Current="10 mA", Nominal Supply Voltage="5 V", Package Quantity=50, Channels=2, ComponentLink1Description="Manufacturer URL", ComponentLink1URL=http://www.panasonic.com/, ComponentLink2Description=Datasheet, ComponentLink2URL=http://industrial.panasonic.com/cdbs/www-data/pdf/RDF0000/DMF0000COL68.pdf, Data Rate="120 kbps", DatasheetVersion=Mar-16, Height="1.5 mm", Interface=RS-232, Length="10 mm", Mount="Surface Mount", PackageDescription="2-Pin Radial Lead, Dia 10 mm, Body Length 12.5 mm", PackageReference=CAPPR65-500-1250X1000X1350, Packaging=Rail/Tube, Pins=16, Propagation Delay="10 us", Radiation Hardening=No, REACH SVHC="No SVHC", RoHSCompliant=true, Width="4 mm"
C12 C13 C22 C23 C32 C33: library part CMP-13271-000587-1, "Cap Ceramic 100nF 50V X7R ±10% Pad SMD 0603 +125°C T/R", Capacitance=100nF, Case/Package=0603, Dielectric=X7R, Max Operating Temperature=125°C, Min Operating Temperature=-55°C, Package Quantity=10000, Tolerance=10%, Voltage=50V, Depth=0.8mm, Height=0.8mm, Lead Free="Lead Free", Length=1.6mm, Material=Ceramic, Mount="Surface Mount", Packaging="Tape and Reel", Radiation Hardening=No, Thickness=0.035inch, Voltage Rating=50V, Voltage Rating (DC)=50V, Width=0.031inch
C14: library part CMP-2007-03541-2, "Chip Multilayer Ceramic Capacitors for General Purpose, 0805, 10uF, X5R, 15%, 10%, 25V", Capacitance=10uF, Case Code (Imperial)=0805, Case Code (Metric)=2012, Dielectric=X5R, Max Operating Temperature=85°C, Min Operating Temperature=-55°C, Package Quantity=1, Tolerance=10%, Voltage=25V, Case/Package=0805, Depth=1.25mm, Height=1.25mm, Lead Free="Lead Free", Length=2mm, Material=Ceramic, Mount="Surface Mount", Packaging="Tape and Reel", Radiation Hardening=No, Termination=SMD/SMT, Thickness=0.053inch, Voltage Rating=25V, Voltage Rating (DC)=25V, Width=0.049inch
C15 C25 C35: library part CMP-2006-04327-2, "General Purpose Ceramic Capacitor, 0603, 4.7pF, 0.25pF, NP0, 30ppm/°C, 50V", Capacitance=4.7pF, Case Code (Imperial)=0603, Case Code (Metric)=1608, Dielectric=C0G, Insulation Resistance=100GR, Max Operating Temperature=125°C, Min Operating Temperature=-55°C, Package Quantity=4000, Temperature Coefficient=30ppm/°C, Voltage Rating=50V, Case/Package=0603, Construction=Flat, Contact Plating=Tin, Depth=0.81mm, Height=0.86mm, Lead Free="Lead Free", Length=1.6mm, Mount="Surface Mount", Number of Pins=2, Packaging="Tape and Reel", Radiation Hardening=No, REACH SVHC="No SVHC", RoHS Compliant=Yes, Series=-, Termination=SMD/SMT, Thickness=0.035inch, Voltage Rating (DC)=50V, Width=0.81mm
C16 C26 C36: library part CMP-2006-02910-1, Manufacturer=Murata, Part Number=GRM188R71H223KA01D
C24 C34: library part CMP-2000-07444-2, "Cap Ceramic 10uF 50V X7S 10% Pad SMD 1210 +125°C Automotive T/R", Capacitance=10uF, Case Code (Imperial)=1210, Case Code (Metric)=3225, Dielectric=X7S, Max Operating Temperature=125°C, Min Operating Temperature=-55°C, Package Quantity=1, Ratings=AEC-Q200, Tolerance=10%, Voltage=50V, Case/Package=1210, Composition=Ceramic, Depth=2.5mm, Height=2.5mm, Lead Free="Lead Free", Length=3.2mm, Mount="Surface Mount", Packaging="Tape and Reel", REACH SVHC="No SVHC", Termination=SMD/SMT, Thickness=0.11inch, Voltage Rating=50V, Voltage Rating (DC)=50V, Weight=0.000564oz, Width=0.098inch
C37: library part CMP-13271-000548-1, "Cap Ceramic 4.7uF 10V X5R ±20% SMD 0402 +85°C Paper T/R", Capacitance=4.7uF, Case Code (Imperial)=0402, Case Code (Metric)=1005, Dielectric=X5R, JLCPCB Part Number=C23733, Max Operating Temperature=85°C, Min Operating Temperature=-55°C, Package Quantity=10000, Tolerance=20%, Voltage Rating=10V, Assembled=yes, Case/Package=0402, Distributor=JLCPCB, Lead Free="Lead Free", Length=0.039inch, Mount="Surface Mount", Packaging="Tape and Reel", Thickness=0.022inch, Width=0.02inch
C38 C41: library part CMP-2000-05439-1, "Chip Capacitor, 100 nF, +/- 10%, 16 V, -55 to 125 degC, 0402 (1005 Metric), RoHS, Tape and Reel", Capacitance=100000pF, Case Size/Dimension=0402, Dielectric=X7R, JLCPCB Part Number=C1525, Manufacturer="Samsung Electro-Mechanics", Rated Voltage=16V, Tolerance (%)=±10%, Assembled=yes, Datasheet URL=https://datasheet.ciiva.com/29198/458718-da-01-en-vs-kondensator-0402-29198423.pdf, Datasheet Version=Nov-10, Distributor=JLCPCB, Manufacturer URL=http://www.samsungsem.com/global/index.jsp
C39: library part CMP-13271-000011-1, "CAP CER 0.1UF 50V X7R 0603", Capacitance=100nF, Manufacturer="Samsung Electro-Mechanics America, Inc", Manufacturer Part Number=CL10B104JB8NNNC, Package=CL10-0.1, Temperature="-55°C to +125°C", Temperature Characteristic=X7R, Temperature Coefficient=15%, Temperature Range High=+125°C, Temperature Range Low=-55°C, Tolerance=5%, Voltage Rating=50V, Automotive=No, Category=Cap, ComponentLink2Description=Datasheet, ComponentLink2URL=http://www.samsungsem.com/kr/support/product-search/mlcc/__icsFiles/afieldfile/2019/06/18/CL10B104JB8NNNC-19.pdf, Device Class L1="Passive Components", Device Class L2=Capacitors, Device Class L3="Ceramic Capacitors", Digikey Description="CAP CER 0.1UF 50V X7R 0603", Height=0.9mm, Ipc Land Pattern Name=CAPC16080X80, Lead Free=Yes, Material=Ceramic, Octopart=https://octopart.com/cl10b104jb8nnnc-samsung-9302151, RoHS=TRUE
C40: library part CMP-13271-001051-1, "Cap Ceramic 1uF 25V X5R ±10% SMD 0402 +85°C Paper T/R", Capacitance=1uF, Case Code (Imperial)=0402, Case Code (Metric)=1005, Dielectric=X5R, JLCPCB Part Number=C52923, Max Operating Temperature=85°C, Min Operating Temperature=-55°C, Package Quantity=10000, Tolerance=10%, Voltage Rating=25V, Assembled=yes, Case/Package=0402, Depth=0.5mm, Distributor=JLCPCB, Height=0.5mm, Lead Free="Lead Free", Length=1mm, Material=Ceramic, Mount="Surface Mount", Packaging="Tape and Reel", Radiation Hardening=No, Thickness=0.022inch, Width=0.02inch
C45: library part CMP-2000-06011-1, "Chip Capacitor, 1 uF, +/- 10%, 50 V, -55 to 125 degC, 1206 (3216 Metric), RoHS, Tape and Reel", Capacitance=1uF, Capacitance - nF=1000nF, Case Code - in=1206, Case Code - mm=3216, Case Height=1mm, Case Length=3.2mm, Case Width=1.6mm, Dielectric=X7R, Manufacturer=Kemet, Maximum Operating Temperature=+125C, Minimum Operating Temperature=-55C, Operating Temperature Range=-55Cto+125C, Package / Case=1206(3216metric), Package Description="2-Pin Surface Mount Device, Body 3.2 x 1.6 mm", Temperature Coefficient / Code=+/-15%, Tolerance=10%, Voltage Rating=50V, Brand=Kemet, Class=Class1, Datasheet URL=http://www.kemet.com/docfinder?Partnumber=C1206C105K5RACTU, Datasheet Version=02/2016, Dimensions=1.6mmWx3.2mmLx1mmH, Factory Pack Quantity=2500, Manufacturer URL=http://www.kemet.com/, Mounting Technology=SurfaceMount, Package Reference=1206, Packaging=Reel, Product=GeneralTypeMLCCs, Product Category=MultilayerCeramicCapacitorsMLCC-SMD/SMT, RoHS=Details, Series=C1206C, Termination Style=SMD/SMT, Type=SMDMLCCX7R6.3-250VDCCommericalGrade, Voltage Rating DC=50V
C46: library part CMP-2006-02545-2, "Chip Multilayer Ceramic Capacitors for General Purpose, 0603, 4.7uF, X5R, 15%, 10%, 35V", Capacitance=4.7uF, Case Code (Imperial)=0603, Case Code (Metric)=1608, Dielectric=X5R, Max Operating Temperature=85°C, Min Operating Temperature=-55°C, Package Quantity=4000, Resistor Type=Ceramic, Tolerance=10%, Voltage=35V, Case/Package=0603, Depth=0.8mm, Height=0.8mm, Lead Free="Lead Free", Length=1.6mm, Material=Ceramic, Mount="Surface Mount", Packaging="Tape and Reel", REACH SVHC="No SVHC", Termination=SMD/SMT, Thickness=0.031inch, Voltage Rating=35V, Voltage Rating (DC)=35V, Weight=0.000222oz, Width=0.8mm
D1: "TVS Diode (Bi-directional)", JLCPCB Part Number=C224021, Manufacturer_Name=Bourns, Mouser Part Number=652-SMBJ43CA-Q, Arrow Part Number=SMBJ43CA-Q, Arrow Price/Stock=https://www.arrow.com/en/products/smbj43ca-q/bourns?region=nac, Assembled=yes, Datasheet Link=https://www.bourns.com/docs/Product-Datasheets/SMBJ-Q.pdf, Distributor=JLCPCB, Height=2.44mm, Manufacturer_Part_Number=SMBJ43CA-Q, Mouser Price/Stock=https://www.mouser.co.uk/ProductDetail/Bourns/SMBJ43CA-Q?qs=f9yNj16SXrKKVbIQ83PDKg%3D%3D
D2 D3: library part CMP-2000-04943-2, "DIODE SCHOTTKY 40V 1A SMA", Forward Current=1A, JLCPCB Part Number=C2480, Manufacturer="ON Semiconductor", Max Junction Temp=+125°C, Max Repetitive Reverse Voltage=40V, Max Surge Forward Current=40A, Package=403AE, Peak Reverse Current=0.2mA, Temperature="-65°C to +125°C", Temperature Range Low=-65°C, Assembled=yes, Automotive=No, Category=Diode, ComponentLink2Description=Datasheet, ComponentLink2URL=https://www.onsemi.com/pub/Collateral/SS19-D.PDF, Device Class L1="Discrete Semiconductors", Device Class L2=Diodes, Device Class L3="Schottky Diodes", Digikey Description="DIODE SCHOTTKY 40V 1A SMA", Distributor=JLCPCB, Height=2.5mm, Lead Free=Yes, Manufacturer Part Number=SS14, Mouser Description="Schottky Diodes & Rectifiers SMA 40V 1.0A", Octopart=https://octopart.com/ss14-on+semiconductor-29205033, RoHS=TRUE, Standoff Height=0.05mm, Temperature Range High=+125°C
F1 F2 F3 F4 F5 F6: library part Fuse_Holder
FB1 FB2 FB3 INTVCC1 INTVCC2 INTVCC3 OUT1 OUT2 OUT3 SCL1 SDA1 SW1 SW2 SW3: library part CMP-2000-05181-1, "Test Point, Black, 1-Pin THD, RoHS, Bulk", Alternate Color="5004K-ND / -TESTPOINTPCMINI.040\"DYELLOW / 5003K-ND / -TESTPOINTPCMINI.040\"DORANGE / 5002K-ND / -TESTPOINTPCMINI.040\"DWHITE / 5000K-ND / -TESTPOINTPCMINI.040\"DRED", Color=Black, Manufacturer=Keystone, Standard Package=100, Catalog Drawings=5000Series, Category=TestandMeasurement, Datasheet URL=https://ciiva.com/datasheet-click-2917627?src=ciiva&sig=bd195616, Datasheet Version="Rev. G, 12/2008", Family=TestPoints, Kits="DKTGRS232C-KIT-ND / -TTLCONVERTER", Manufacturer URL=http://www.keyelco.com/, Material=Base,Nylon46,UL94V-0, Mounting Type="0.040\"(1.02mm)HoleDiameter", Online Catalog=ColorCodedTestPoints, Other Names=5001K, Packaging=Bulk, RoHS Information=RoHSComplianceStatement, Series=THM, Terminal="0.010\"x0.020\"(0.25mmx0.51mm)PhosphorBronzeWire,SilverPlated", Type=PCTestPoint,Miniature
GLED1 "PWR GOOD1": library part CMP-1426-00006-4, "WL-SMCW SMD Chip LED Top View Monocolor Waterclear, 30 mA, 2 V, -40 to 85 degC, 2-Pin SMD, RoHS, Tape and Reel", ComponentLink1Description="Manufacturer URL", ComponentLink1URL=https://www.we-online.com/, ComponentLink2Description=Datasheet, ComponentLink2URL=http://katalog.we-online.de/led/datasheet/150060VS75000.pdf, DatasheetVersion="Rev. 2.7", Mounting Technology="Surface Mount", PackageDescription="2-Pin Surface Mount Device, Body 1.6 x 0.8 mm", PartNumber=150060VS75000, RoHSCompliant=True
I1: library part HEADER_POS4_?44914-0401, Package=44914-0401, DeviceName=44914-0401, DeviceSetName=HEADER_POS4_?, GateName_1=G$1, LibraryName=con-molex-micro-fit-3_0_2, SymbolName_1=HEADER_POS4
InputVoltage1 X7: library part HEADER_POS2_?44914-0201, Package=44914-0201, DeviceName=44914-0201, DeviceSetName=HEADER_POS2_?, GateName_1=G$1, LibraryName=con-molex-micro-fit-3_0_2, SymbolName_1=HEADER_POS2
J1: "Connector", Manufacturer_Name="TE Connectivity", Mouser Part Number=571-1546927-2, Arrow Part Number=1546927-2, Arrow Price/Stock=https://www.arrow.com/en/products/1546927-2/te-connectivity, Datasheet Link=https://www.te.com/commerce/DocumentDelivery/DDEController?Action=showdoc&DocId=Customer+Drawing%7F1546927%7FA3%7Fpdf%7FEnglish%7FENG_CD_1546927_A3.pdf%7F1546927-2, Height=15.494mm, Manufacturer_Part_Number=1546927-2, Mouser Price/Stock=https://www.mouser.co.uk/ProductDetail/TE-Connectivity/1546927-2?qs=30v%252BXxGwGAoQPG4oeAAMCA%3D%3D
L1 L2: library part XAL6030-102MEC
L3: library part CMP-11268-000140-1, "Surface Mount Power Inductor, AEC-Q200 XAL6060 Series, 4.7 H, 20%, Shielded, 0.0144 ohm, 11 A", Case/Package=SMD/SMT, DC Resistance (DCR)=14.4mR, Inductance=4.7uH, Inductance Tolerance=20%, Max DC Current=11A, Max Operating Temperature=125°C, Min Operating Temperature=-40°C, Package Quantity=250, Saturation Current=10.5A, Self Resonant Frequency=21MHz, Test Frequency=100kHz, Core Material=Composite, Height=6.1mm, Lead Free="Contains Lead", Length=6.76mm, Mount="Surface Mount", Packaging="Tape and Reel", RMS Current (Irms)=11A, RoHS Compliant=Yes, Series=XAL6060, Shielding=Shielded, Termination=SMD/SMT, Tolerance=20%, Width=6.56mm
LDO1: library part CMP-12153-000006-1, "IC REG LINEAR 3.3V 1.2A SOT223", Dropout Voltage=350mV, Manufacturer=STMicroelectronics, Max Junction Temp=+125°C, Max Supply Voltage=18V, Min Supply Voltage=2.6V, Nominal Supply Current=250uA, Output Current=2A, Output Voltage=3.3V, Package=SOT223-0046067, Temperature="-40°C to +125°C", Temperature Range Low=-40°C, Accuracy Percentage=2%, Automotive=No, Category=IC, ComponentLink2Description=Datasheet, ComponentLink2URL=https://www.st.com/resource/en/datasheet/ldl1117.pdf, Device Class L1="Integrated Circuits (ICs)", Device Class L2="Power Management ICs", Device Class L3="Voltage Regulators - Linear", Digikey Description="IC REG LINEAR 3.3V 1.2A SOT223", Height=1.9mm, Ipc Land Pattern Name=SOT230P700X190-4, Lead Free=Yes, Manufacturer Part Number=LDL1117S33R, Mouser Description="LDL1117 Series 1.2 A 3.3 V High PSRR LDO Linear Voltage Regulator-SOT-223", Number Of Outputs=1, Octopart=https://octopart.com/ldl1117s33r-stmicroelectronics-81876163, Output Type=Fixed, RoHS=TRUE, Standoff Height=0.02mm, Temperature Range High=+125°C
LED1 LED2 LED3: library part CMP-1426-00016-1, "SMD mono-color Chip LED, WL-SMCW, Bright Green", Color="Bright Green", Manufacturer="Wuerth Elektronik", ComponentLink1Description="Manufacturer URL", ComponentLink1URL=http://www.we-online.com, ComponentLink2Description=Datasheet, ComponentLink2URL=http://katalog.we-online.com/led/datasheet/150120VS75000.pdf, PackageReference=1206_A, PartNumber=150120VS75000
MUX1: library part CMP-04901-000007-1, "IC MUX/DEMUX 1X16 24SOIC", Ambient Temperature Range High=+125°C, Ambient Temperature Range Low=-55°C, Manufacturer="Texas Instruments", Max Junction Temp=+150°C, Max Supply Voltage=6V, Min Supply Voltage=2V, Package=DW0024A, Quiescent Current=8uA, Temperature="-55°C to +125°C", Automotive=No, Category=IC, ComponentLink2Description=Datasheet, ComponentLink2URL=http://www.ti.com/lit/ds/symlink/cd74hc4067.pdf, Device Class L1="Integrated Circuits (ICs)", Device Class L2="Logic ICs", Device Class L3=Multiplexers, Digikey Description="IC MUX/DEMUX 1X16 24SOIC", Height=2.65mm, Ipc Land Pattern Name=SOIC127P1030X265-24, Lead Free=Yes, Logic Function Desc=Non-Inverting, Manufacturer Part Number=CD74HC4067M96, Mouser Description="Multiplexer Switch ICs Hi-Spd CMOS 16Ch Anl Mltplxr/Demltplxr", Number Of Circuits=1, Number Of Inputs=16, Number Of Outputs=1, Octopart=https://octopart.com/cd74hc4067m96-texas+instruments-722802, Propagation Delay=6ns, RoHS=TRUE, Standoff Height=0.1mm, Temperature Range High=+125°C, Temperature Range Low=-55°C
P1: "Header, 2-Pin, Dual row", LatestRevisionDate=17-Jul-2002, LatestRevisionNote="Re-released for DXP Platform.", Publisher="Altium Limited"
Q2 Q3 Q4: library part CMP-2000-06485-1, "HEXFET Power MOSFET / , 60 V, 2.7 A, -55 to 150 degC, 3-Pin SOT-23, RoHS, Tape and Reel", Forward Diode Voltage=1.3V, Manufacturer="International Rectifier", Maximum Continuous Drain Current=2.7A, Maximum Drain Source Resistance=92mΩ, Maximum Drain Source Voltage=60V, Maximum Gate Source Voltage=±16V, Maximum Operating Temperature=+150°C, Maximum Power Dissipation=1.25W, Minimum Operating Temperature=-55°C, Operating Temperature Range=-55to+150°C, Package Description="3-Pin Small Outline Transistor, Body 2.92 x 1.3 mm, Pitch 0.95 mm", Package Reference=SOT-23-3, Package Type=Micro8, Typical Input Capacitance @ Vds=290pF@25V, Category=PowerMOSFET, Channel Mode=Enhancement, Channel Type=N, Configuration=Single, Datasheet URL=http://www.infineon.com/dgdl/irlml0060pbf.pdf?fileId=5546d462533600a40153566493ef25e6, Datasheet Version=03/2012, Dimensions=3.04x1.40x1.02mm, Forward Transconductance=7.6S, Height=1.02mm, Length=3.04mm, Manufacturer URL=http://internationalrectifier.com/, Mounting Technology=SurfaceMount, Mounting Type=SurfaceMount, Number of Elements per Chip=1, Pin Count=3, Series=HEXFET®Series, Typical Gate Charge @ Vgs=2.5nC@4.5V, Typical Turn On Delay Time=5.4ns, Typical TurnOff Delay Time=6.8ns, Width=1.4mm
R1: library part CMP-2000-03059-2, "RES Thick Film, 200kΩ, 1%, 0.1W, 100ppm/°C, 0603", Case Code (Imperial)=0603, Case Code (Metric)=1608, Max Operating Temperature=155°C, Max Power Dissipation=100mW, Min Operating Temperature=-55°C, Package Quantity=10, Resistance=200kR, Temperature Coefficient=100ppm/°C, Tolerance=1%, Voltage Rating=75V, Case/Package=0603, Composition="Thick Film", Contact Plating=Tin, Depth=0.85mm, Features="Automotive AEC-Q200", Height=0.45mm, Lead Free="Lead Free", Length=1.55mm, Military Standard=Not, Mount="Surface Mount", Number of Terminations=2, Packaging="Tape and Reel", Power Rating=100mW, Radiation Hardening=No, Termination=SMD/SMT, Voltage Rating (DC)=75V, Weight=7.1E-05oz, Width=0.033inch, Working Voltage=75V
R2 R12 R17 R22: library part CMP-2100-03662-2, "RES SMD 100K OHM 1% 1/10W 0603", Case Code (Imperial)=0603, Case Code (Metric)=1608, Max Operating Temperature=155°C, Max Power Dissipation=100mW, Min Operating Temperature=-55°C, Resistance=100kR, Resistance Tolerance=1%, Resistor Type="Thick Film", Temperature Coefficient=100ppm/°C, Voltage Rating=50V, Working Voltage=75V, Case/Package=0603, Construction=Rectangular, Depth=0.8mm, Features="Moisture Resistant", Height=0.45mm, Lead Free="Lead Free", Length=1.6mm, Military Standard=Not, Number of Pins=2, Number of Terminations=2, Packaging="Tape and Reel", Power Rating=100mW, REACH SVHC="No SVHC", RoHS Compliant=Yes, Series=RC, Technology="THICK FILM", Termination=SMD/SMT, Tolerance=1%, Voltage Rating (DC)=50V, Width=0.8mm
R3 R4 R5: library part CMP-02407-001779-1, "RES Thick Film, 3.9kΩ, 1%, 0.1W, 100ppm/°C, 0603", Case Code (Imperial)=0603, Case Code (Metric)=1608, Max Operating Temperature=155°C, Max Power Dissipation=100mW, Min Operating Temperature=-55°C, Package Quantity=10, Resistance=3.9kR, Temperature Coefficient=100ppm/°C, Tolerance=1%, Voltage Rating=75V, Case/Package=0603, Composition="Thick Film", Contact Plating=Tin, Depth=0.85mm, Features="Automotive AEC-Q200", Height=0.45mm, Lead Free="Lead Free", Length=1.55mm, Military Standard=Not, Mount="Surface Mount", Number of Terminations=2, Packaging="Tape and Reel", Power Rating=100mW, Radiation Hardening=No, Termination=SMD/SMT, Voltage Rating (DC)=75V, Weight=7.1E-05oz, Width=0.033inch, Working Voltage=75V
R6 R7 R8: library part CMP-2000-03216-2, "RES Thick Film, 300Ω, 1%, 0.1W, 100ppm/°C, 0603", Case Code (Imperial)=0603, Case Code (Metric)=1608, Max Operating Temperature=155°C, Max Power Dissipation=100mW, Min Operating Temperature=-55°C, Package Quantity=10, Resistance=300R, Temperature Coefficient=100ppm/°C, Tolerance=1%, Voltage Rating=75V, Case/Package=0603, Composition="Thick Film", Contact Plating=Tin, Depth=0.85mm, Features="Automotive AEC-Q200", Height=0.45mm, Lead Free="Lead Free", Length=1.55mm, Military Standard=Not, Mount="Surface Mount", Number of Terminations=2, Packaging="Tape and Reel", Power Rating=100mW, Radiation Hardening=No, Termination=SMD/SMT, Voltage Rating (DC)=75V, Weight=7.1E-05oz, Width=0.033inch
R9 R14 R19: library part CMP-2000-03013-2, "RES Thick Film, 1MΩ, 1%, 0.1W, 100ppm/°C, 0603", Case Code (Imperial)=0603, Case Code (Metric)=1608, Max Operating Temperature=155°C, Max Power Dissipation=100mW, Min Operating Temperature=-55°C, Package Quantity=10, Resistance=1MR, Temperature Coefficient=100ppm/°C, Tolerance=1%, Voltage Rating=75V, Case/Package=0603, Composition="Thick Film", Contact Plating=Tin, Depth=0.85mm, Features="Automotive AEC-Q200", Height=0.45mm, Lead Free="Lead Free", Length=1.55mm, Military Standard=Not, Mount="Surface Mount", Number of Pins=2, Number of Terminations=2, Packaging="Tape and Reel", Power Rating=100mW, Radiation Hardening=No, Termination=SMD/SMT, Voltage Rating (DC)=75V, Weight=7.1E-05oz, Width=0.85mm
R10 R15 R20: library part CMP-1012-00692-3, "RES Thick Film, 41.2kΩ, 1%, 0.1W, 100ppm/°C, 0603", Case Code (Imperial)=0603, Case Code (Metric)=1608, Max Operating Temperature=155°C, Max Power Dissipation=100mW, Min Operating Temperature=-55°C, Package Quantity=10, Resistance=41.2kR, Temperature Coefficient=100ppm/°C, Tolerance=1%, Voltage Rating=75V, Case/Package=0603, Composition="Thick Film", Contact Plating=Tin, Depth=0.85mm, Features="Automotive AEC-Q200", Height=0.45mm, Lead Free="Lead Free", Length=1.55mm, Military Standard=Not, Mount="Surface Mount", Number of Terminations=2, Packaging="Tape and Reel", Power Rating=100mW, Radiation Hardening=No, Termination=SMD/SMT, Voltage Rating (DC)=75V, Weight=7.1E-05oz, Width=0.033inch
R11: library part CMP-2000-00492-1, Manufacturer=Panasonic, Part Number=ERJ-3EKF4123V
R13 R18 R23: library part CMP-2000-00213-2, "Chip Resistor, 120 Ohm, +/- 1%, 0.1 W, -55 to 155 degC, 0603 (1608 Metric), RoHS, Tape and Reel", Case Code (Imperial)=0603, Case Code (Metric)=1608, Manufacturer=Panasonic, Max Operating Temperature=155degC, Max Power Dissipation=100mW, Min Operating Temperature=-55degC, Package Description="2-Pin Surface Mount Device, Body 1.6 x 0.85 mm", Package Quantity=1, Resistance=120Ohm, Temperature Coefficient=100ppm/degreesC, Tolerance=1%, Voltage Rating=75V, Case/Package=0603, Composition=ThickFilm, Contact Plating=Tin, Datasheet URL=https://industrial.panasonic.com/cdbs/www-data/pdf/RDA0000/AOA0000C283.pdf, Datasheet Version=42095.0, Depth=0.8mm, Height=0.022inch, Lead Free=LeadFree, Length=1.6mm, Manufacturer URL=http://www.panasonic.com/, Military Standard=Not, Mount=SurfaceMount, Number of Pins=2, Number of Terminations=2, Package Reference=0603, Package URL=http://www.st.com/st-web-ui/static/active/en/resource/technical/document/datasheet/CD00001320.pdf, Packaging=TapeandReel, Power Rating=100mW, Radiation Hardening=No, REACH SVHC=NoSVHC, RoHSCompliant=true, Termination=SMD/SMT, Voltage Rating (DC)=75V, Width=0.031inch
R16: library part CMP-2000-03103-2, "RES Thick Film, 232kΩ, 1%, 0.1W, 100ppm/°C, 0603", Case Code (Imperial)=0603, Case Code (Metric)=1608, Max Operating Temperature=155°C, Max Power Dissipation=100mW, Min Operating Temperature=-55°C, Package Quantity=10, Resistance=232kR, Temperature Coefficient=100ppm/°C, Tolerance=1%, Voltage Rating=75V, Case/Package=0603, Composition="Thick Film", Contact Plating=Tin, Depth=0.85mm, Features="Automotive AEC-Q200", Height=0.45mm, Lead Free="Lead Free", Length=1.55mm, Military Standard=Not, Mount="Surface Mount", Number of Pins=2, Number of Terminations=2, Packaging="Tape and Reel", Power Rating=100mW, Radiation Hardening=No, Termination=SMD/SMT, Voltage Rating (DC)=75V, Weight=7.1E-05oz, Width=0.85mm
R21: library part CMP-2000-03602-2, "RES Thick Film, 82kΩ, 1%, 0.1W, 100ppm/°C, 0603", Case Code (Imperial)=0603, Case Code (Metric)=1608, Max Operating Temperature=155°C, Max Power Dissipation=100mW, Min Operating Temperature=-55°C, Package Quantity=10, Resistance=82kR, Temperature Coefficient=100ppm/°C, Tolerance=1%, Voltage Rating=75V, Case/Package=0603, Composition="Thick Film", Contact Plating=Tin, Depth=0.85mm, Features="Automotive AEC-Q200", Height=0.45mm, Lead Free="Lead Free", Length=1.55mm, Military Standard=Not, Number of Pins=2, Number of Terminations=2, Packaging="Tape and Reel", Power Rating=100mW, Radiation Hardening=No, Termination=SMD/SMT, Voltage Rating (DC)=75V, Weight=7.1E-05oz, Width=0.85mm, Working Voltage=75V
R24 R27 R29: library part 0402WGF1200TCE, "±1% 1/16W ±100ppm/℃ 120Ω 0402 Chip Resistor - Surface Mount ROHS", JLCPCB Part Number=C25079, Manufacturer=UNI-ROYAL, Assembled=yes, Distributor=JLCPCB, Manufacturer Part Number=0402WGF1200TCE, Price=$0.0015
R25 R30: library part CMP-1012-00623-3, "Chip Resistor, 10 KOhm, +/- 1%, 0.1 W, -55 to 155 degC, 0603 (1608 Metric), RoHS, Tape and Reel", Case Code (Imperial)=0603, Case Code (Metric)=1608, Manufacturer=Panasonic, Max Operating Temperature=155degC, Max Power Dissipation=100mW, Min Operating Temperature=-55degC, Package Description="2-Pin Surface Mount Device, Body 1.6 x 0.85 mm", Package Quantity=1, Package Reference=603, Resistance=10KOhm, Temperature Coefficient=100ppm\/degreesC, Tolerance=1%, Voltage Rating=75V, Case\/Package=0603, Composition=ThickFilm, Contact Plating=Tin, Datasheet URL=https://industrial.panasonic.com/cdbs/www-data/pdf/RDA0000/AOA0000C304.pdf, Datasheet Version=02/2017, Depth=0.8mm, Height=0.45mm, Lead Free=LeadFree, Length=1.6mm, Manufacturer URL=http://www.panasonic.com/, Military Standard=Not, Mount=SurfaceMount, Mounting Technology=SurfaceMount, Number of Pins=2, Number of Terminations=2, Packaging=TapeandReel, Power Rating=100mW, Radiation Hardening=No, REACH SVHC=NoSVHC, RoHSCompliant=true, Termination=SMD/SMT, Voltage Rating (DC)=75V, Width=0.031inch
R26 R28: library part 0402WGF4701TCE, "1/16W ±1% 4.7kΩ ±100ppm/℃ 0402 Chip Resistor - Surface Mount ROHS", JLCPCB Part Number=C25900, Manufacturer=UNI-ROYAL, Assembled=yes, Distributor=JLCPCB, Manufacturer Part Number=0402WGF4701TCE, Price=$0.0015
R31: library part 0402WGF1002TCE, "1/16W ±1% ±100ppm/℃ 10kΩ 0402 Chip Resistor - Surface Mount ROHS", JLCPCB Part Number=C25744, Manufacturer=UNI-ROYAL, Assembled=yes, Distributor=JLCPCB, Manufacturer Part Number=0402WGF1002TCE, Price=$0.0012